# Altium PCB Control Board-v1.0.PcbDoc (part 1 of 8)
Units mil, origin at the board's own origin, x right, y up, seen from the top; angles counter-clockwise.
Board outline 7874.02 x 5118.11 mil, 4 copper layers (Top Layer, Layer 1, Layer 2, Bottom Layer), stack 61.654 mil thick; 475 components, 366 nets, 1579 pads, 587 vias.
Unrouted connection lines stored in the file: 427.
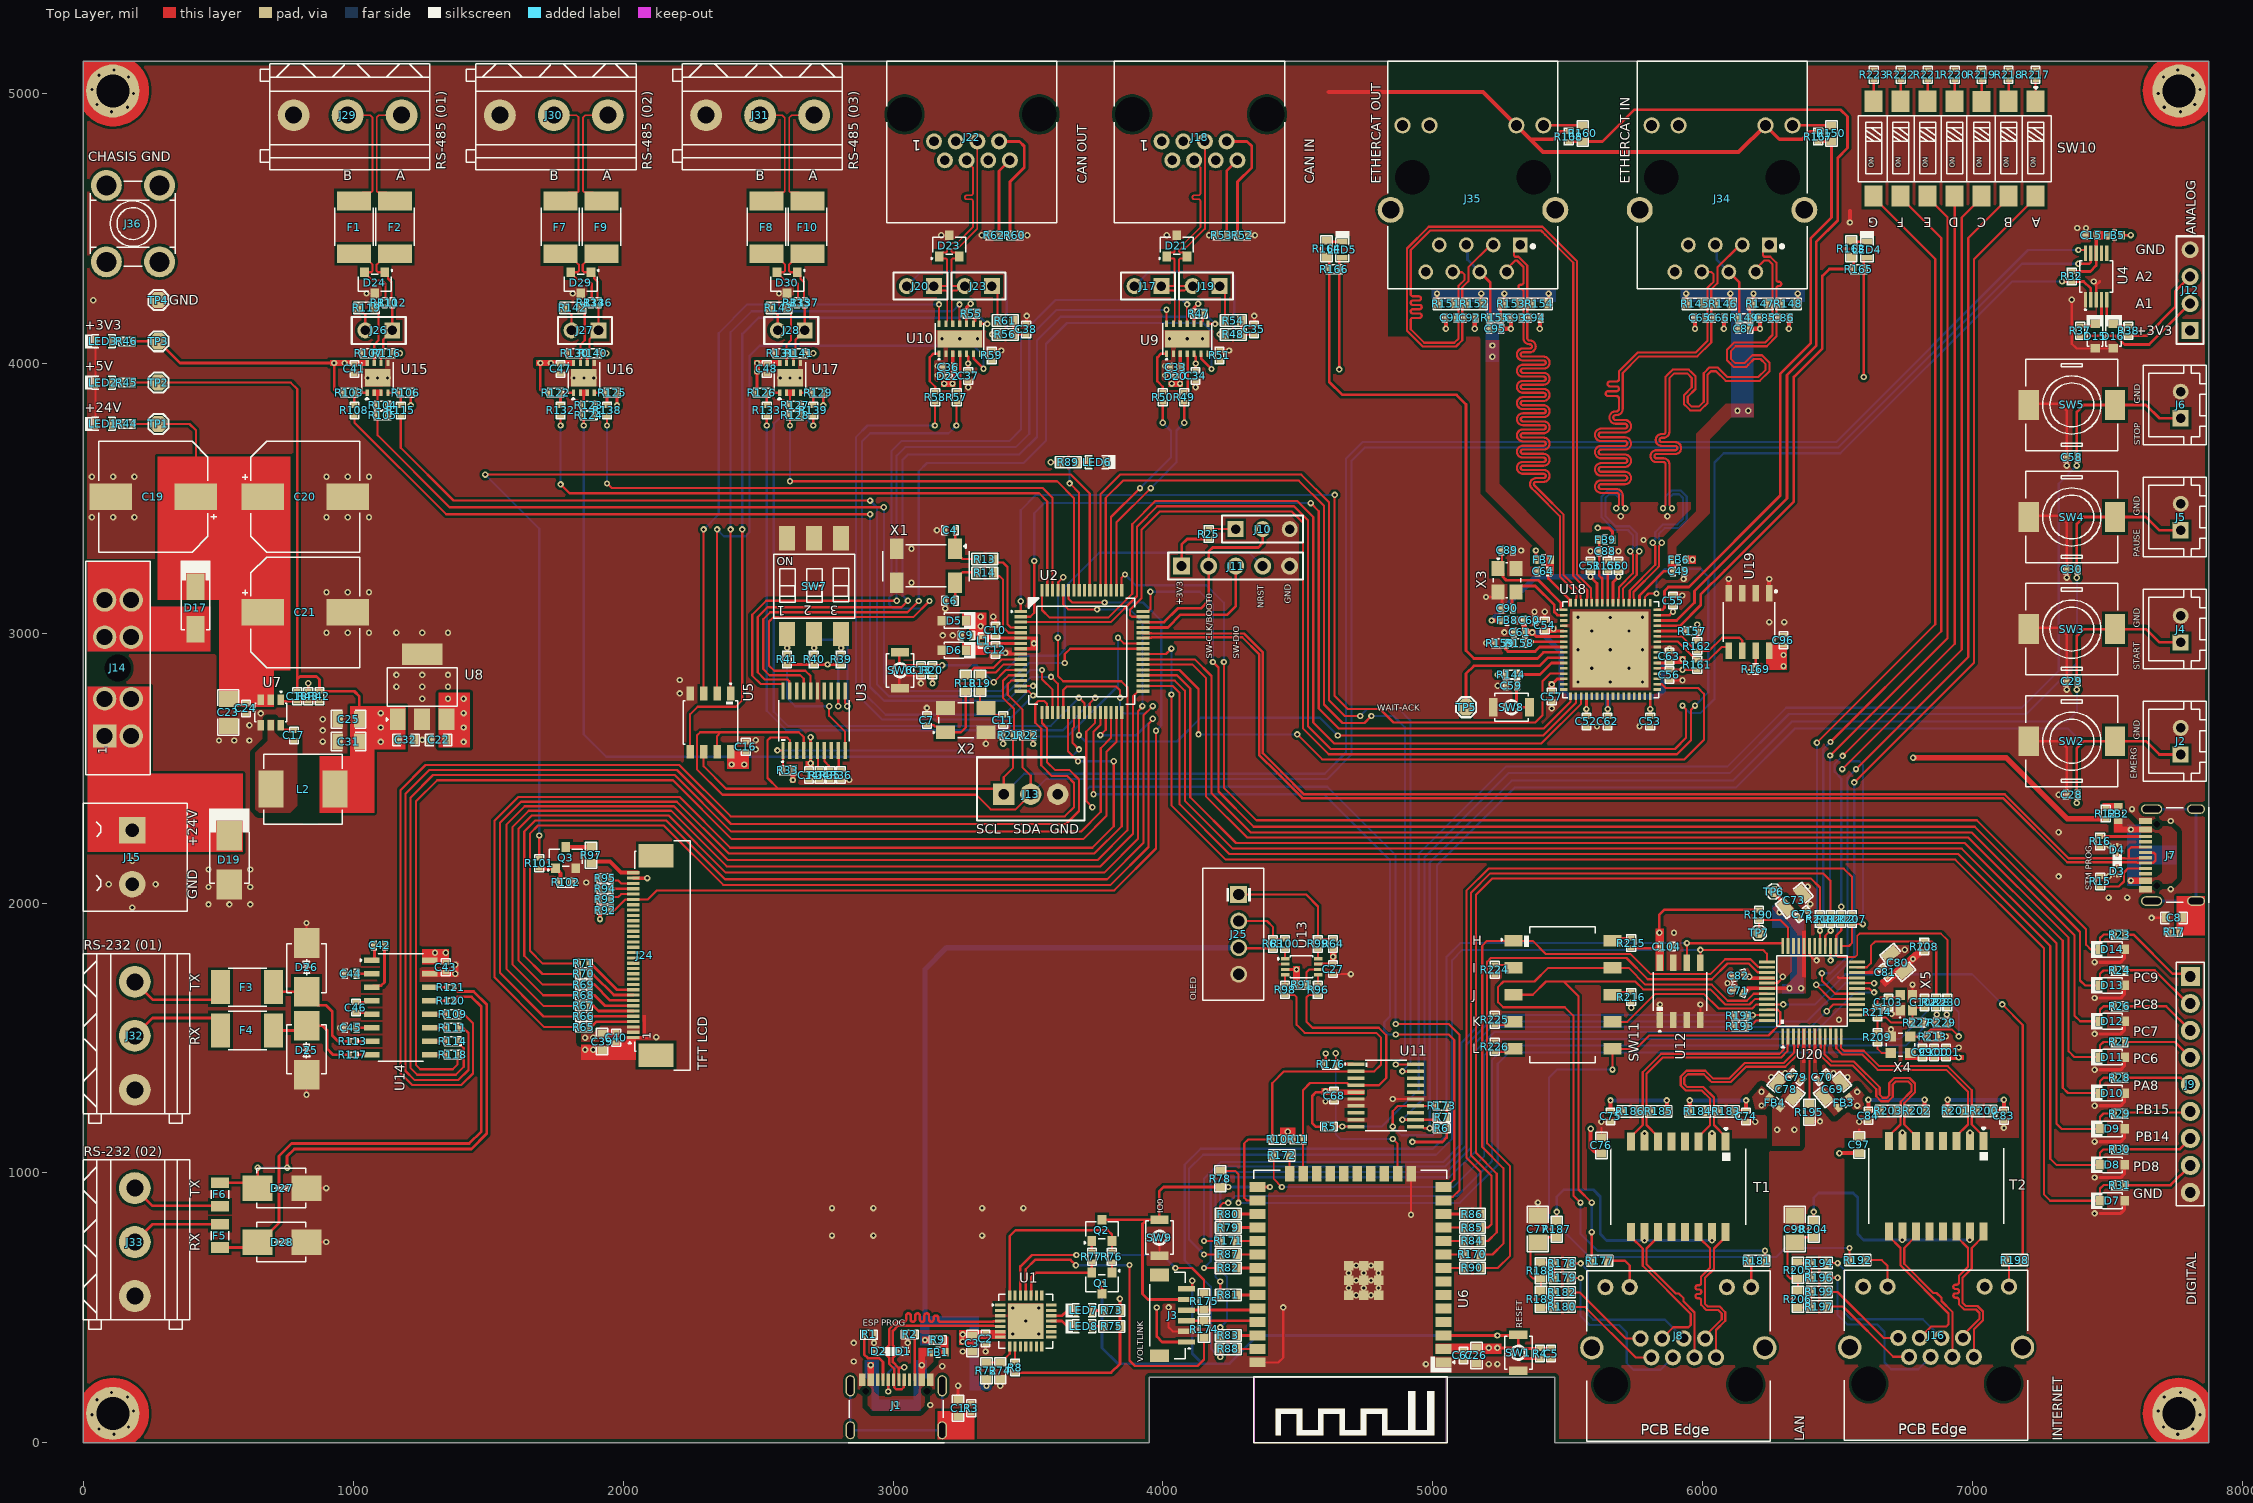
[diagram p0: Top Layer view]
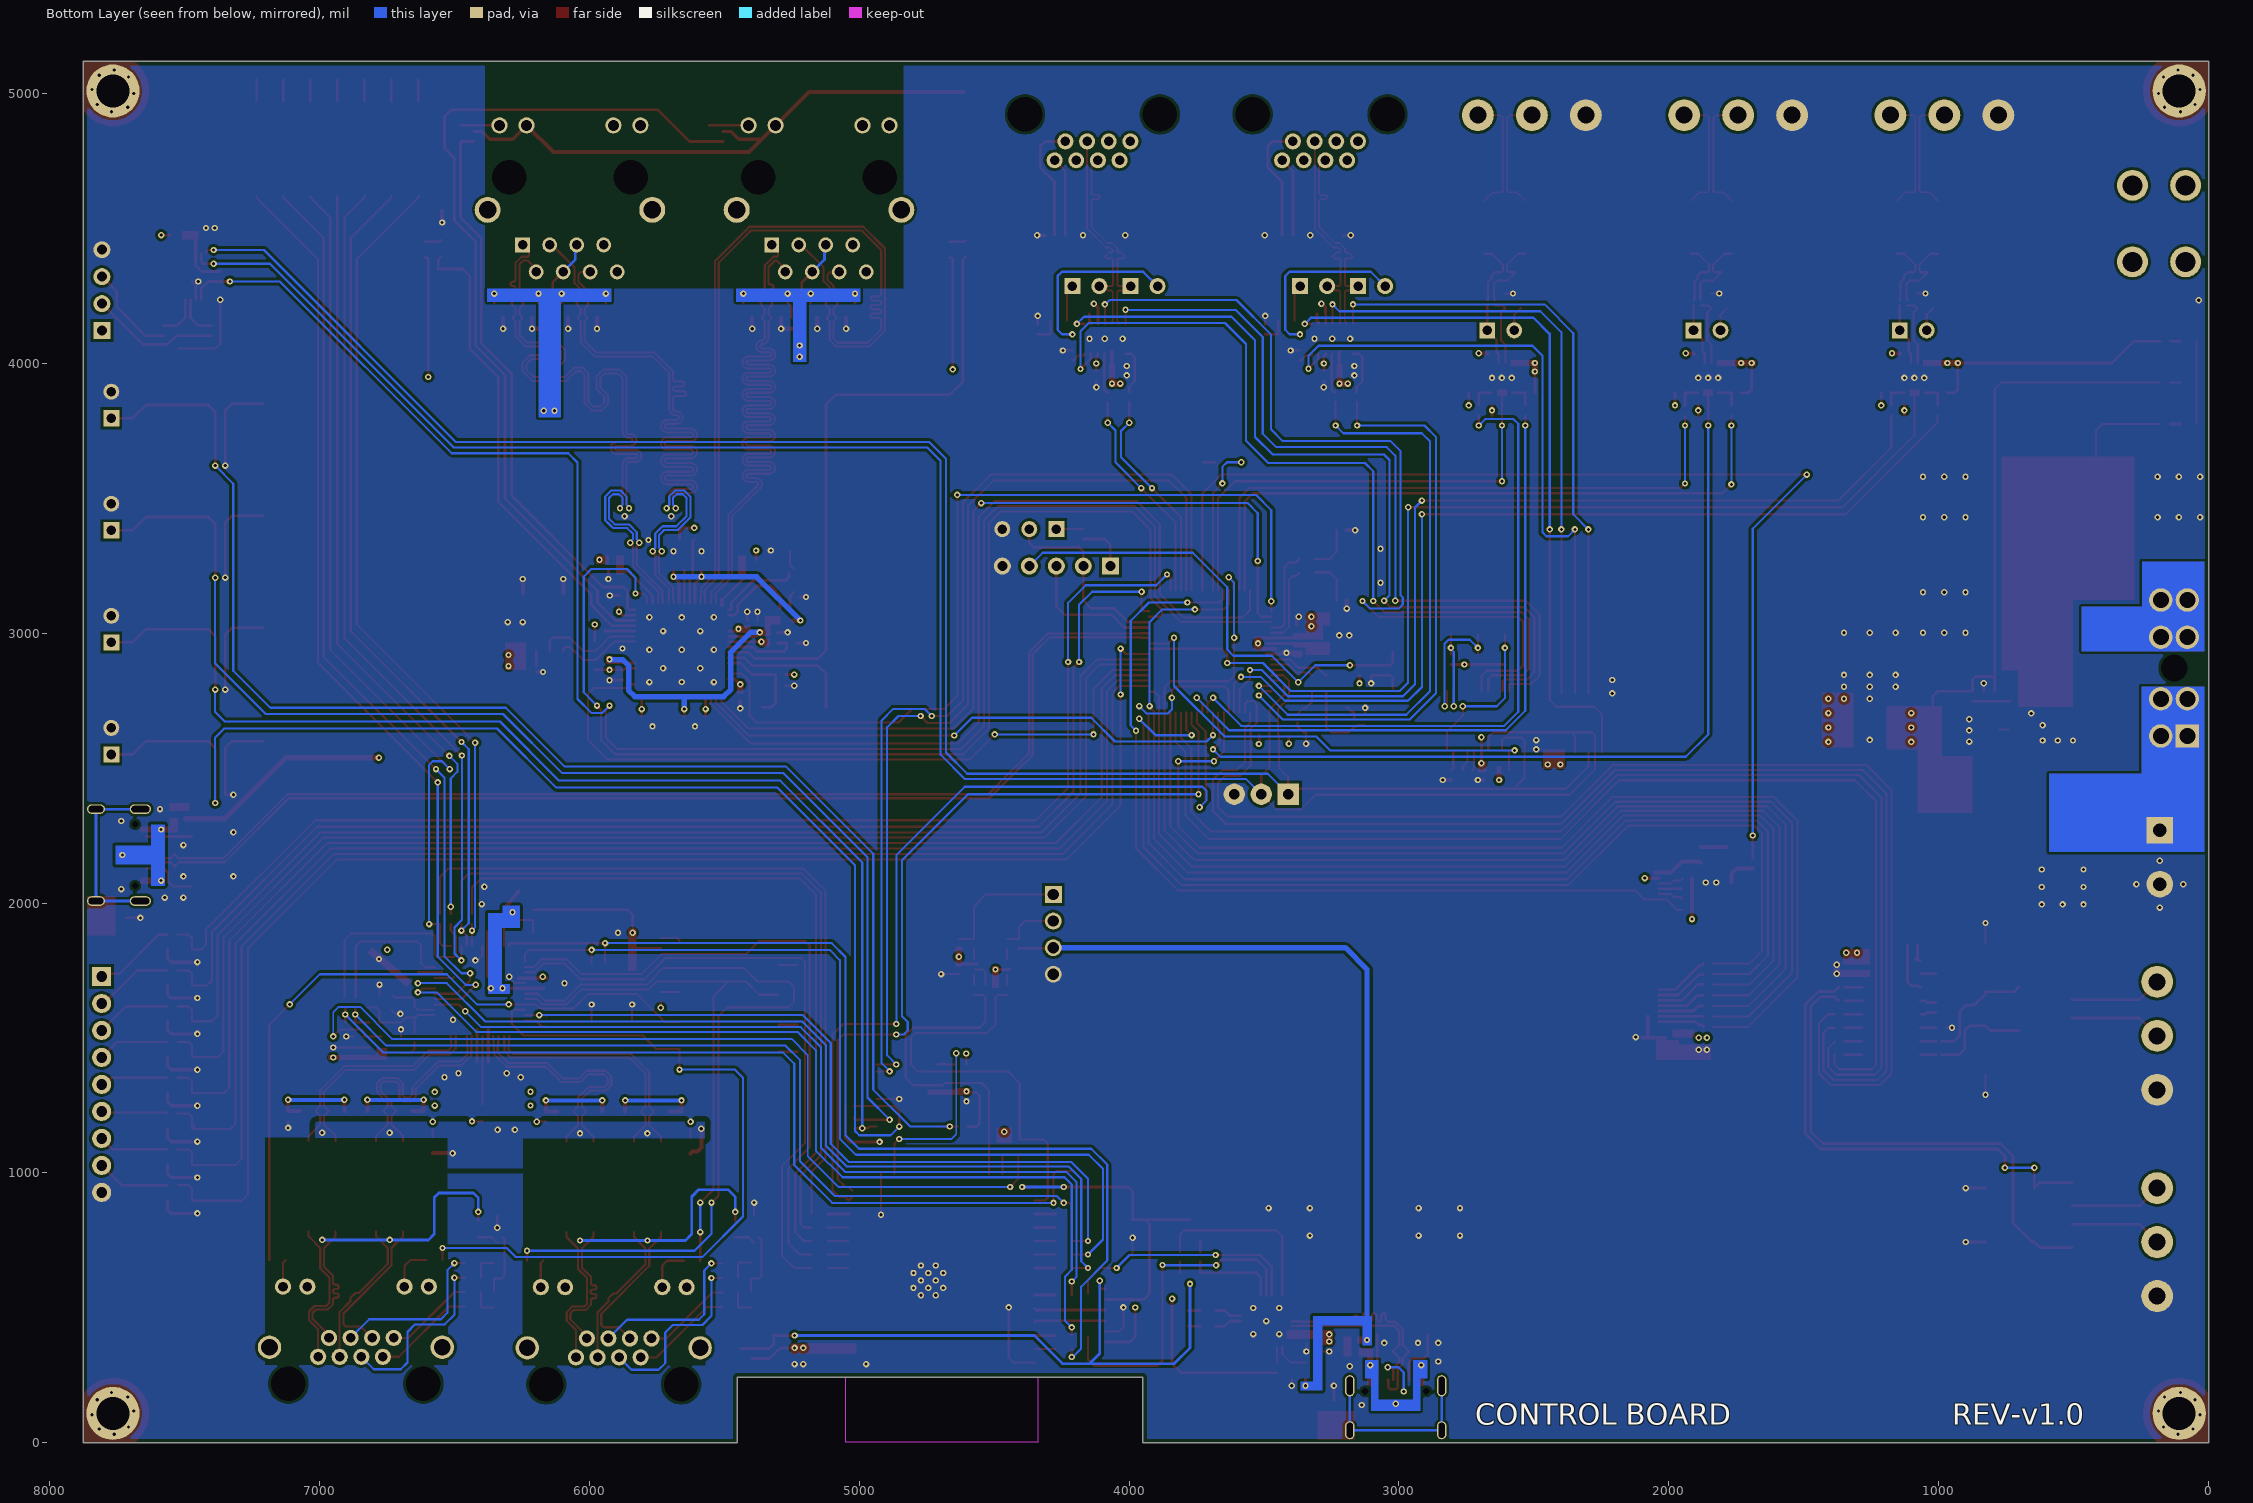
[diagram p1: Bottom Layer view, seen from below]
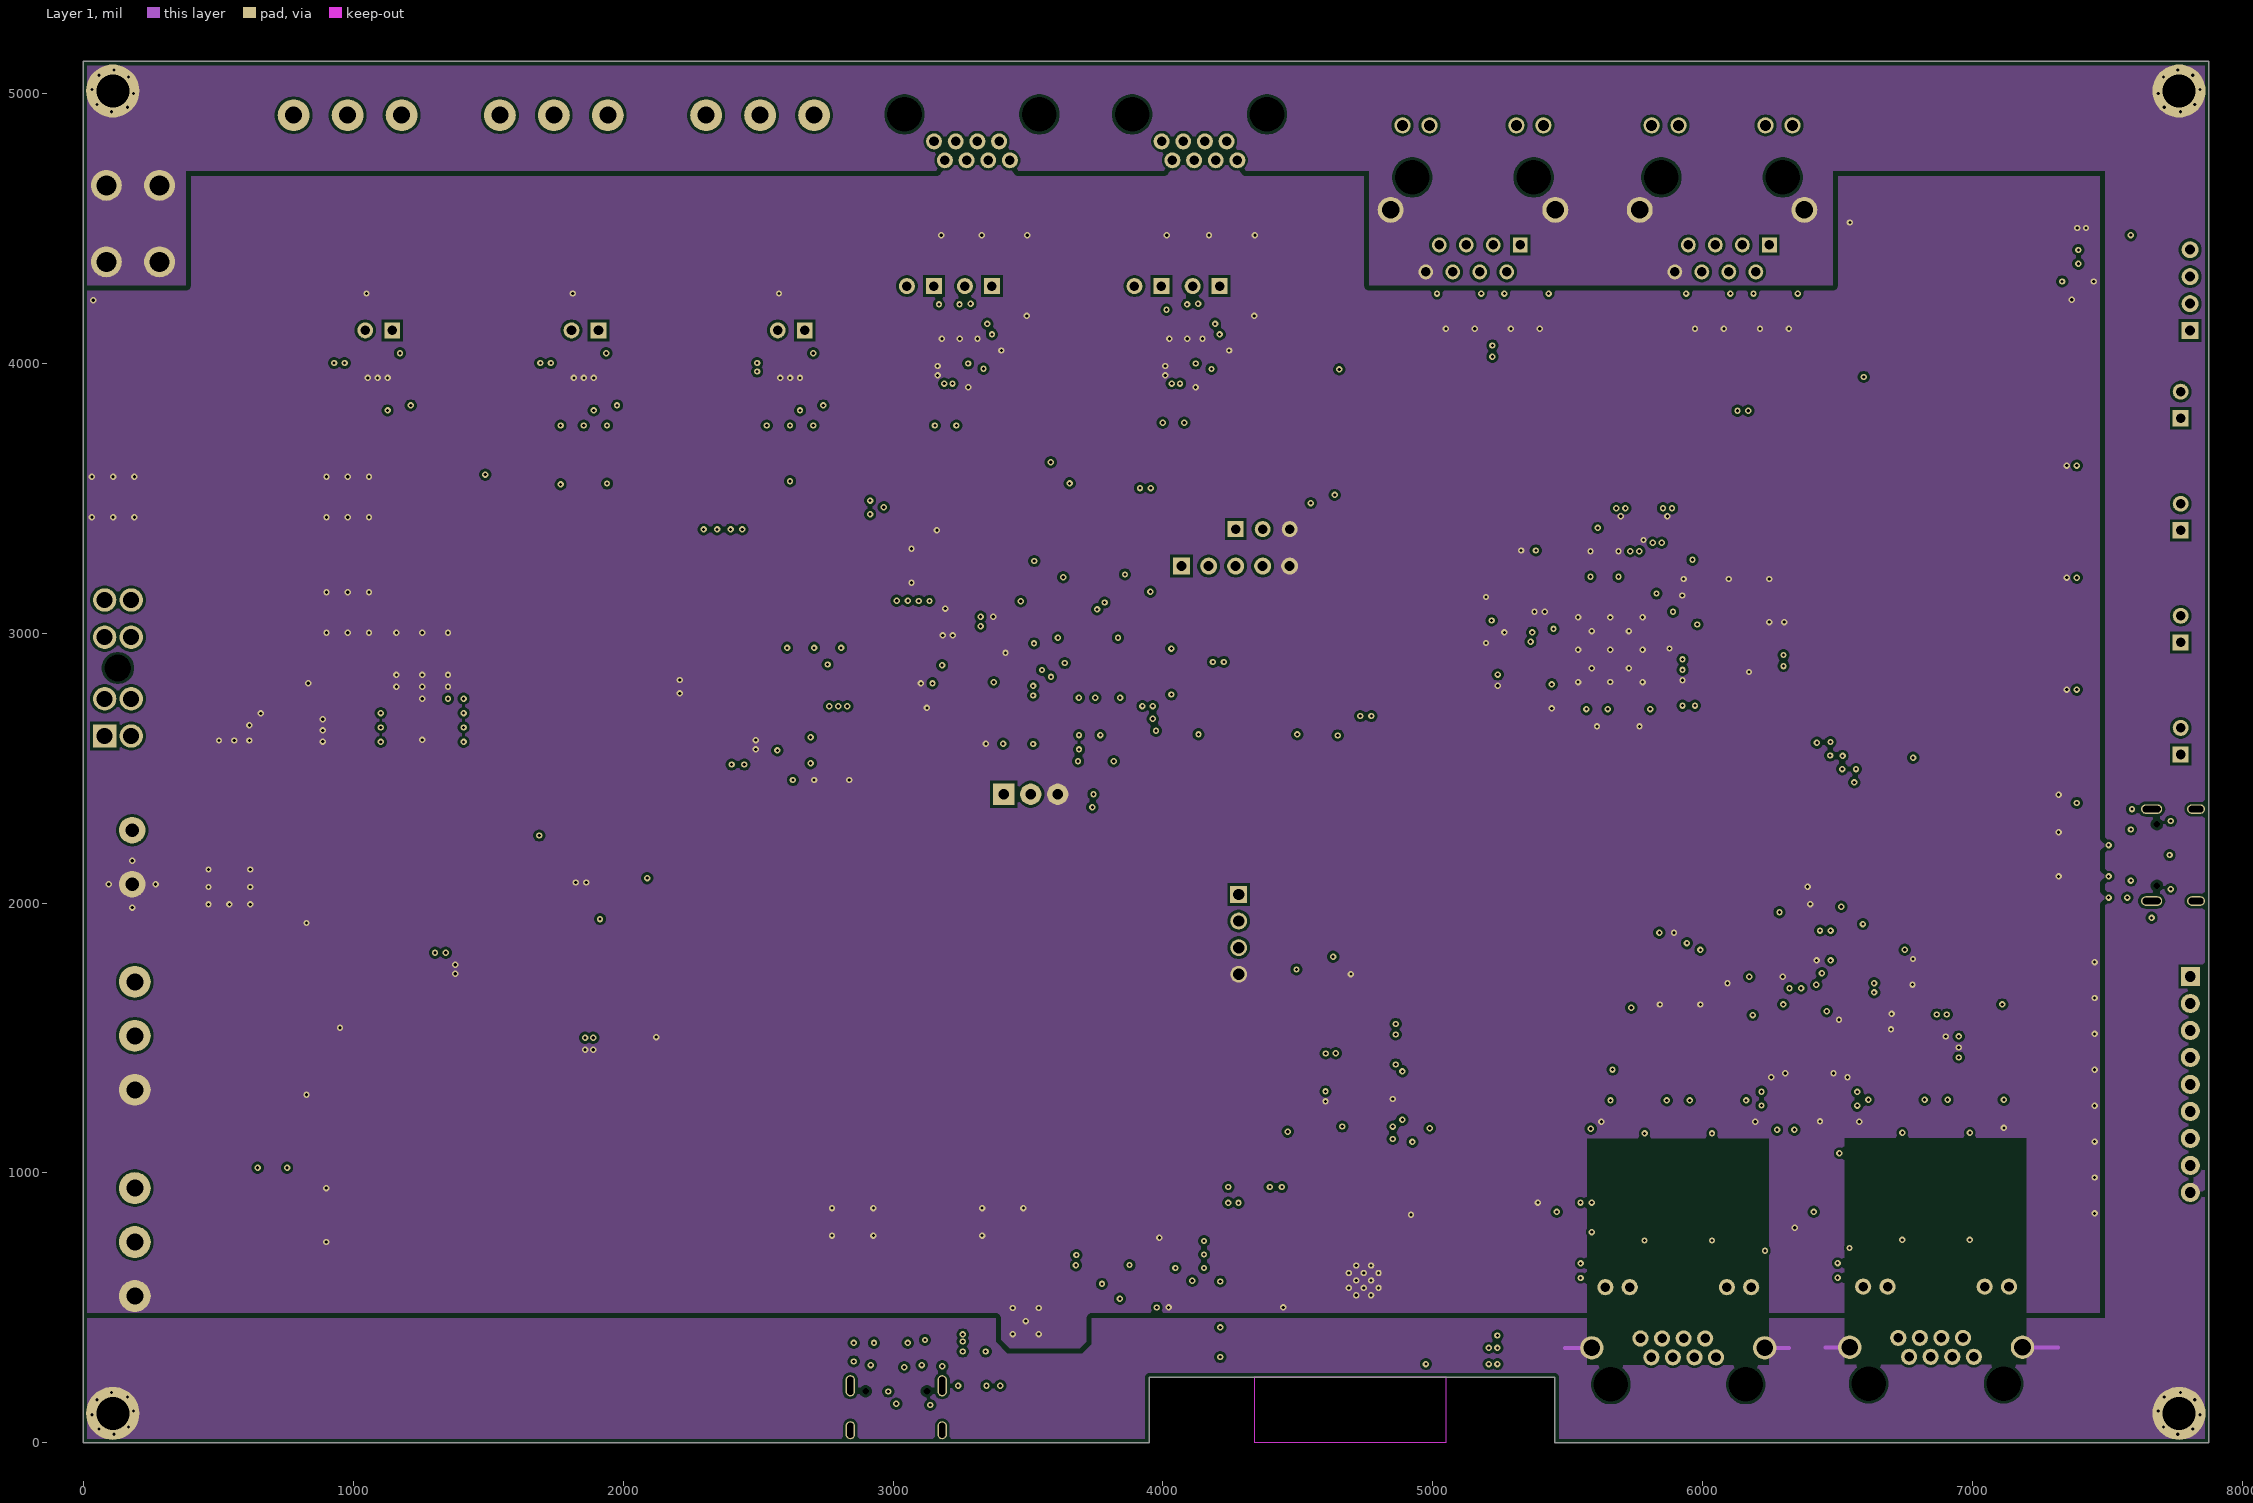
[diagram p2: Layer 1]
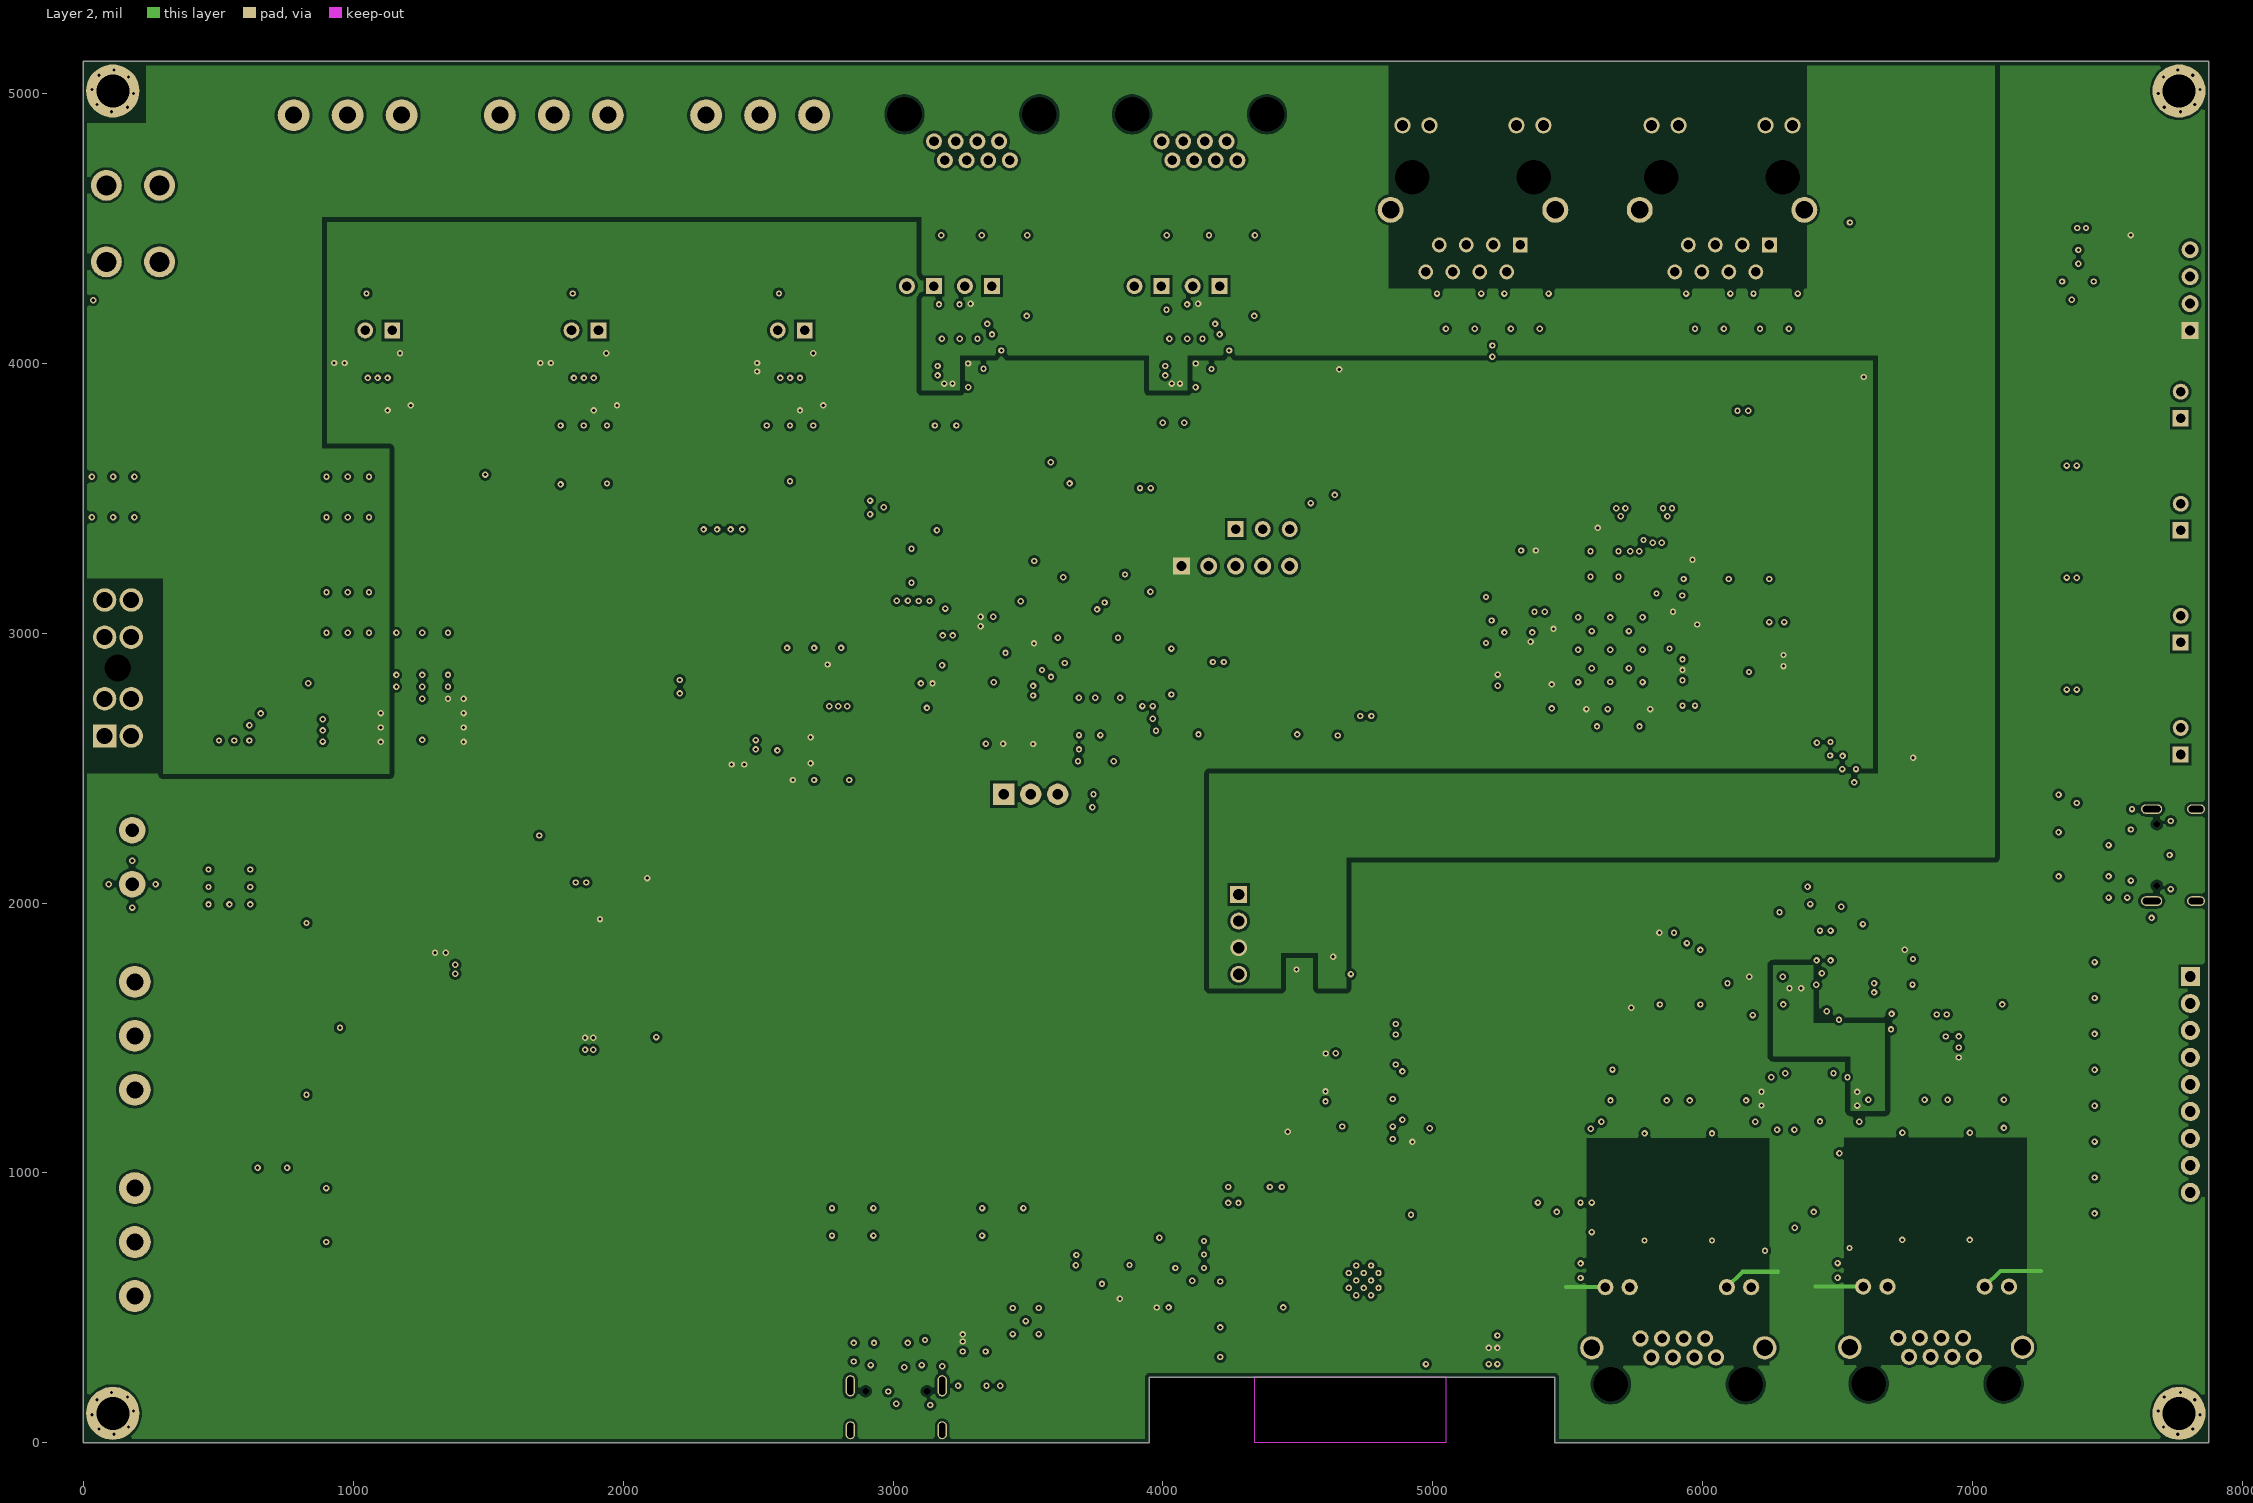
[diagram p3: Layer 2]
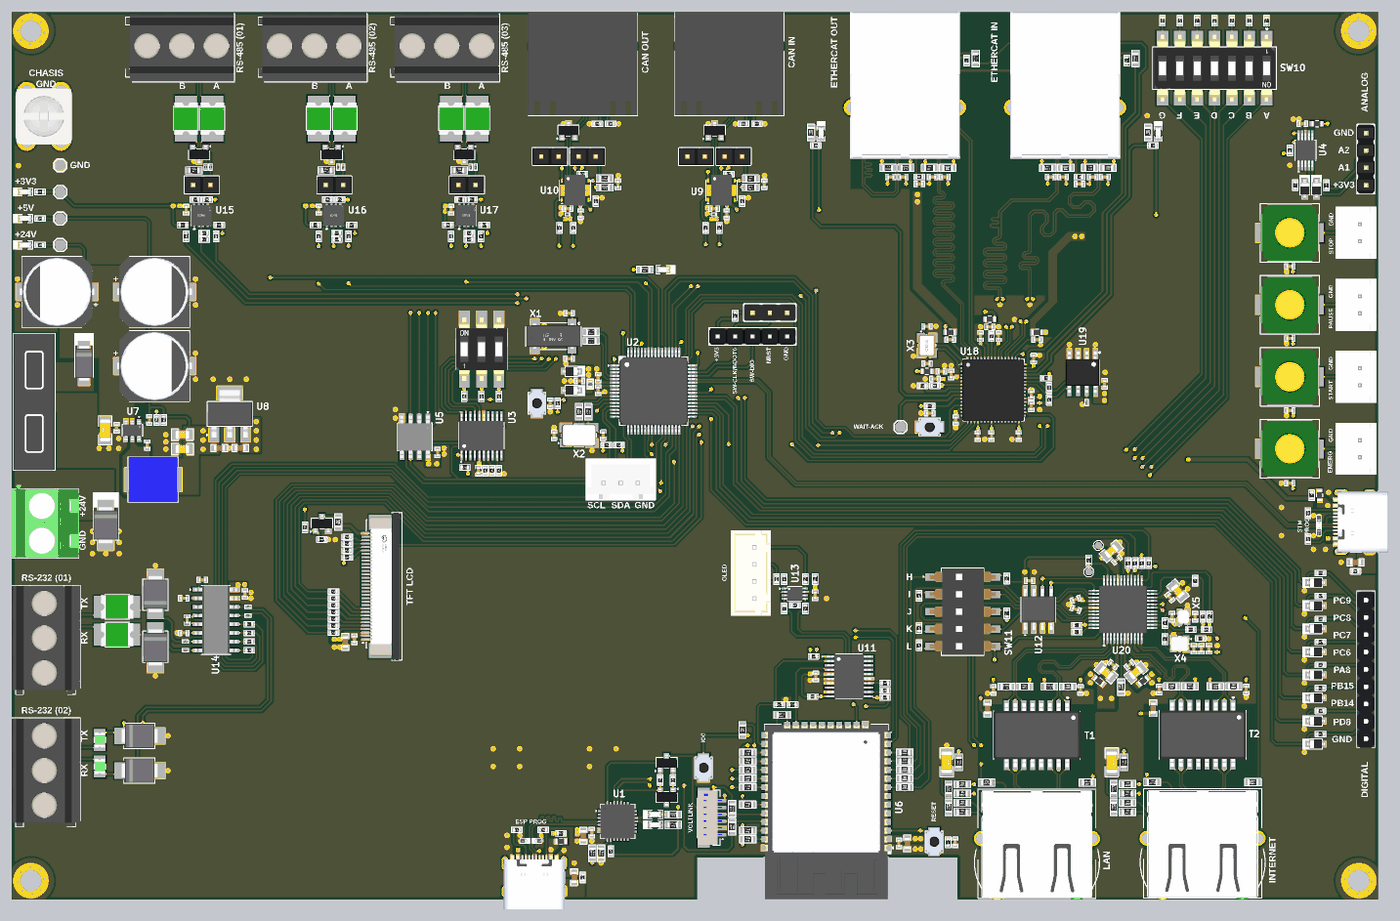
[diagram p8: 3D render of the assembled board from above, using the file's embedded part models]

## Layer stack, top to bottom
Top Solder: solder mask 0.787, Solder Resist, Dk 3.5
Top Layer: signal copper 1.378
Dielectric 2: prepreg 7.9921, PP-006, Dk 4.4
Layer 1: signal copper 1.1811
Dielectric 1: core 40.5512, FR-4, Dk 4.6
Layer 2: signal copper 1.1811
Dielectric 3: prepreg 7.9921, PP-006, Dk 4.4
Bottom Layer: signal copper 1.378
Bottom Solder: solder mask 0.787, Solder Resist, Dk 3.5

## Board outline
0,0 0,5118.11 7874.02,5118.11 7874.02,0 5451.93,0 5451.93,244.11 3948.53,244.11 3948.53,0

## Design rules (kind name [scope] priority, off if disabled: settings)
BoardOutlineClearance [All] p1: gap=0 ignorepadtopadclearanceinfootprint=FALSE except(15: Poly-OutlineEdge)
Clearance [All] p1: gap=10 ignorepadtopadclearanceinfootprint=FALSE except(5: Arc-Track Arc-THPad Track-Track Track-THPad SMDPad-Hole; 6: Arc-Arc SMDPad-THPad; 7: Arc-SMDPad Track-SMDPad SMDPad-SMDPad SMDPad-Fill THPad-Fill Fill-Fill Fill-Hole; 8: Arc-Fill Track-Via Track-Fill; 20: Poly-Poly)
DiffPairsRouting Ethernet [InDifferentialPairClass('Ethernet Lines')] p1: maxlimit=10 minlimit=6 mostfreqgap=10 toplayer_maxgap=6 toplayer_prefgap=6 toplayer_minwidth=8 toplayer_maxwidth=8 toplayer_prefwidth=8 bottomlayer_maxgap=6 bottomlayer_prefgap=6 bottomlayer_minwidth=8 bottomlayer_maxwidth=8 bottomlayer_prefwidth=8 impedanceprofiledriven=TRUE impedanceprofileid={E2375095-BF4E-4929-BD81-C9DC39CB62B4} impedanceprofilevalue=100.000000 maxuncoupledlength=500
DiffPairsRouting Ethercat [InDifferentialPairClass('EtherCAT_A_Lines')] p2: maxlimit=10 minlimit=6 mostfreqgap=10 toplayer_maxgap=6 toplayer_prefgap=6 toplayer_minwidth=8 toplayer_maxwidth=8 toplayer_prefwidth=8 bottomlayer_maxgap=6 bottomlayer_prefgap=6 bottomlayer_minwidth=8 bottomlayer_maxwidth=8 bottomlayer_prefwidth=8 impedanceprofiledriven=TRUE impedanceprofileid={E2375095-BF4E-4929-BD81-C9DC39CB62B4} impedanceprofilevalue=100.000000 maxuncoupledlength=500
DiffPairsRouting "RS485 120" [InDifferentialPairClass('RS485_LINES')] p3: maxlimit=10 minlimit=10 mostfreqgap=10 toplayer_minwidth=6.5 toplayer_maxwidth=6.5 toplayer_prefwidth=6.5 bottomlayer_minwidth=6.5 bottomlayer_maxwidth=6.5 bottomlayer_prefwidth=6.5 impedanceprofiledriven=TRUE impedanceprofileid={57E785CF-240E-48B3-B531-E0493D17EEC1} impedanceprofilevalue=120.000000 maxuncoupledlength=500
DiffPairsRouting CAN [InDifferentialPairClass('CAN_Lines')] p4: maxlimit=10 minlimit=10 mostfreqgap=10 toplayer_minwidth=6.5 toplayer_maxwidth=6.5 toplayer_prefwidth=6.5 bottomlayer_minwidth=6.5 bottomlayer_maxwidth=6.5 bottomlayer_prefwidth=6.5 impedanceprofiledriven=TRUE impedanceprofileid={57E785CF-240E-48B3-B531-E0493D17EEC1} impedanceprofilevalue=120.000000 maxuncoupledlength=500
DiffPairsRouting USB [InDifferentialPairClass('USB_PROGRAM_LINES')] p5: maxlimit=10 minlimit=5 mostfreqgap=10 toplayer_maxgap=5 toplayer_prefgap=5 toplayer_minwidth=9 toplayer_maxwidth=9 toplayer_prefwidth=9 bottomlayer_maxgap=5 bottomlayer_prefgap=5 bottomlayer_minwidth=9 bottomlayer_maxwidth=9 bottomlayer_prefwidth=9 impedanceprofiledriven=TRUE impedanceprofileid={29A86D70-821F-4898-9481-CB8ACAF6D4DB} impedanceprofilevalue=90.000000 maxuncoupledlength=500
HoleSize [All] p1: absolutevalues=TRUE maxlimit=150 minlimit=1 maxpercent=80.000 minpercent=20.000
MatchedLengths "Schematic Matched Net Lengths_4" [InNetClass('RS485')] p1: tolerance=20 checknetsindiffpair=TRUE checkdiffpairvsdiffpair=FALSE checkxsignals=FALSE checkothers=FALSE
MatchedLengths "Schematic Matched Net Lengths_8" [InDifferentialPairClass('Ethernet-2 A Lines')] p2: tolerance=20 checknetsindiffpair=FALSE checkdiffpairvsdiffpair=TRUE checkxsignals=TRUE checkothers=TRUE
MatchedLengths "Schematic Matched Net Lengths_7" [InDifferentialPairClass('Ethernet-2 B Lines')] p3: tolerance=20 checknetsindiffpair=FALSE checkdiffpairvsdiffpair=TRUE checkxsignals=TRUE checkothers=TRUE
MatchedLengths "Schematic Matched Net Lengths_6" [InDifferentialPairClass('Ethernet-1 B Lines')] p4: tolerance=20 checknetsindiffpair=FALSE checkdiffpairvsdiffpair=TRUE checkxsignals=TRUE checkothers=TRUE
MatchedLengths "Schematic Matched Net Lengths_5" [InDifferentialPairClass('Ethernet-1 A Lines')] p5: tolerance=20 checknetsindiffpair=FALSE checkdiffpairvsdiffpair=TRUE checkxsignals=TRUE checkothers=TRUE
MatchedLengths "Schematic Matched Net Lengths_2" [InNetClass('USB')] p6: tolerance=50 checknetsindiffpair=TRUE checkdiffpairvsdiffpair=FALSE checkxsignals=FALSE checkothers=FALSE
MatchedLengths "Schematic Matched Net Lengths_1" [InNetClass('EtherCAT_A')] p7: tolerance=25.4 checknetsindiffpair=FALSE checkdiffpairvsdiffpair=TRUE checkxsignals=TRUE checkothers=TRUE
MatchedLengths [InDifferentialPairClass('CAN_Lines')] p8: tolerance=20 checknetsindiffpair=TRUE checkdiffpairvsdiffpair=FALSE checkxsignals=FALSE checkothers=FALSE
MatchedLengths "Schematic Matched Net Lengths_3" [InDifferentialPairClass('USB_PROGRAM_LINES')] p9: tolerance=50 checknetsindiffpair=TRUE checkdiffpairvsdiffpair=FALSE checkxsignals=FALSE checkothers=FALSE
MaxMinImpedance "Schematic Impedance Constraint_8" [InDifferentialPairClass('Ethernet-2 B Lines')] p1: minimum=97.00 maximum=103.0
MaxMinImpedance "Schematic Impedance Constraint_7" [InDifferentialPairClass('Ethernet-1 A Lines')] p2: minimum=97.00 maximum=103.0
MaxMinImpedance "Schematic Impedance Constraint_6" [InDifferentialPairClass('Ethernet-2 A Lines')] p3: minimum=97.00 maximum=103.0
MaxMinImpedance "Schematic Impedance Constraint_2" [InDifferentialPairClass('Ethernet-1 B Lines')] p4: minimum=97.00 maximum=103.0
MaxMinImpedance "Schematic Impedance Constraint_5" [InDifferentialPairClass('USB_PROGRAM_LINES')] p5: minimum=85.00 maximum=90.00
MaxMinImpedance "Schematic Impedance Constraint_4" [InNetClass('USB')] p6: minimum=85.00 maximum=90.00
MaxMinImpedance "Schematic Impedance Constraint_3" [InNetClass('RS485')] p7: minimum=115.0 maximum=125.0
MaxMinImpedance "Schematic Impedance Constraint_1" [InNetClass('EtherCAT_A')] p8: minimum=85.00 maximum=95.00
MinimumSolderMaskSliver [All] p1: minsoldermaskwidth=0
PolygonConnect [All] p1: connectstyle=Direct reliefconductorwidth=10 reliefentries=4 polygonreliefangle="90 Angle" airgapwidth=10
RoutingVias [All] p1: holewidth=11.81 width=23.62 viastyle="Through Hole" minholewidth=11.81 minwidth=23.62 maxholewidth=11.81 maxwidth=23.62
SilkToSilkClearance [All] p1: silktosilkclearance=0
SilkToSolderMaskClearance [IsPad] p1: minsilkscreentomaskgap=0 clearancetoexposedcopper=TRUE
SolderMaskExpansion [All] p1: expansion=4 istentingtop=FALSE
SupplyNets "Schematic Supply Nets_11" [InNet('VDD33TXRX2')] p1: voltage=0.000
SupplyNets "Schematic Supply Nets_10" [InNet('+1.8V')] p2: voltage=0.000
SupplyNets "Schematic Supply Nets_9" [InNet('VDD33TXRX1')] p3: voltage=0.000
SupplyNets "Schematic Supply Nets_8" [InNet('+3V3-A')] p4: voltage=0.000
SupplyNets "Schematic Supply Nets_7" [InNet('CHASIS GND')] p5: voltage=0.000
SupplyNets "Schematic Supply Nets_6" [InNet('GND')] p6: voltage=0.000
SupplyNets "Schematic Supply Nets_5" [InNet('+24V')] p7: voltage=0.000
SupplyNets "Schematic Supply Nets_4" [InNet('+5V')] p8: voltage=0.000
SupplyNets "Schematic Supply Nets_3" [InNet('+1.8V-A')] p9: voltage=0.000
SupplyNets "Schematic Supply Nets_2" [InNet('+3V3')] p10: voltage=0.000
SupplyNets "Schematic Supply Nets_1" [InNet('VDDCR')] p11: voltage=0.000
SupplyNets "Schematic Supply Nets" [InNet('VDD12TX1')] p12: voltage=0.000
UnRoutedNet [All] p1: checkbadconnections=TRUE
Width [All] p1: maxlimit=30 minlimit=7 preferedwidth=15 toplayer_prefwidth=10 midlayer1_minwidth=10 midlayer1_maxwidth=20 midlayer2_minwidth=10 midlayer2_maxwidth=20 bottomlayer_prefwidth=10 minimp=50.000000 maximp=50.000000 favimp=50.000000
24 further rules are at their usual default settings.

## Classes and differential pairs
differential pair class "Ethernet-2 B Lines": RX2 TX2
differential pair class "Ethernet-2 A Lines": 2RX 2TX
differential pair class "Ethernet-1 A Lines": 1RX 1TX
differential pair class "Ethernet-1 B Lines": RX1 TX1
differential pair class USB_Lines: ESPUSB
net class USB: ESPUSB_N ESPUSB_P
differential pair class USB_PROGRAM_LINES: ESPUSB USB
differential pair class RS485_LINES: RS485 RS485-2 RS485-3
differential pair class EtherCAT_A_Lines: RXA RXB TXA TXB
differential pair class CAN_Lines: CAN1 CAN2
net class USB_PROGRAM: ESPUSB_N ESPUSB_P USB_N USB_P
net class RS485: RS485-2_N RS485-2_P RS485-3_N RS485-3_P RS485_N RS485_P
net class EtherCAT_A: RXA_N RXA_P RXB_N RXB_P TXA_N TXA_P TXB_N TXB_P
net class CAN: CAN1_N CAN1_P CAN2_N CAN2_P
component class U_TFT_Display_Sheet: C27 C39 C40 J24 J25 Q3 R63 R64 R65 R66 R67 R68 R69 R70 R71 R91 R92 R93 R94 R95 R96 R97 R98 R99 R100 R101 R102 U13
component class U_STM32_Sheet: C4 C6 C7 C8 C9 C10 C11 C12 C13 C14 C15 C16 D3 D4 D5 D6 D7 D8 D9 D10 D11 D12 D13 D14 D15 D16 FB2 FB5 J7 J9 J10 J11 J12 J13 L1 LED6 R12 R13 R14 R15 R16 R17 R18 R19 R20 R21 R22 R23 R24 R25 R26 R27 R28 R29 R30 R31 R32 R33 R34 R35 R36 R37 R38 R39 R40 R41 R89 SW6 SW7 U2 U3 U4 U5 X1 X2
component class U_RS485_RS232_Sheet: C41 C42 C43 C44 C45 C46 C47 C48 D24 D25 D26 D27 D28 D29 D30 F1 F2 F3 F4 F5 F6 F7 F8 F9 F10 J26 J27 J28 J29 J30 J31 J32 J33 R103 R104 R105 R106 R107 R108 R109 R110 R111 R112 R113 R114 R115 R116 R117 R118 R119 R120 R121 R122 R123 R124 R125 R126 R127 R128 R129 R130 R131 R132 R133 R134 R135 R136 R137 R138 R139 R140 R141 R142 R143 U14 U15 U16 U17
component class U_Power_Sheet: C17 C18 C19 C20 C21 C22 C23 C24 C25 C31 C32 D17 D19 J14 J15 L2 LED1 LED2 LED3 R42 R43 R44 R45 R46 TP1 TP2 TP3 TP4 U7 U8
component class U_Ethernet_Sheet: C69 C70 C71 C72 C73 C74 C75 C76 C77 C78 C79 C80 C81 C82 C83 C84 C97 C98 C99 C100 C101 C102 C103 C104 FB3 FB4 J8 J16 R177 R178 R179 R180 R181 R182 R183 R184 R185 R186 R187 R188 R189 R190 R191 R192 R193 R194 R195 R196 R197 R198 R199 R200 R201 R202 R203 R204 R205 R206 R207 R208 R209 R210 R211 R212 R213 R214 R215 R216 R217 R218 R219 R220 R221 R222 R223 R224 R225 R226 R227 R228 R229 R230 SW10 SW11 T1 T2 TP6 TP7 U12 U20 X4 X5
component class U_EtherCAT_Sheet: C49 C50 C51 C52 C53 C54 C55 C56 C57 C59 C60 C61 C62 C63 C64 C65 C66 C85 C86 C87 C88 C89 C90 C91 C92 C93 C94 C95 C96 FB6 FB7 FB8 FB9 J34 J35 J36 LED4 LED5 R144 R145 R146 R147 R148 R149 R150 R151 R152 R153 R154 R155 R156 R157 R158 R159 R160 R161 R162 R163 R164 R165 R166 R167 R168 R169 SW8 TP5 U18 U19 X3
component class U_ESP32_Sheet: C1 C2 C3 C5 C26 C28 C29 C30 C58 C67 C68 D1 D2 FB1 J1 J2 J3 J4 J5 J6 LED7 LED8 Q1 Q2 R1 R2 R3 R4 R5 R6 R7 R8 R9 R10 R11 R72 R73 R74 R75 R76 R77 R78 R79 R80 R81 R82 R83 R84 R85 R86 R87 R88 R90 R170 R171 R172 R173 R174 R175 R176 SW1 SW2 SW3 SW4 SW5 SW9 U1 U6 U11
component class U_CAN_Sheet: C33 C34 C35 C36 C37 C38 D20 D21 D22 D23 J17 J18 J19 J20 J22 J23 R47 R48 R49 R50 R51 R52 R53 R54 R55 R56 R57 R58 R59 R60 R61 R62 U9 U10
differential pair TX2: +TX2_P -TX2_N
differential pair TX1: +TX1_P -TX1_N
differential pair RX2: +RX2_P -RX2_N
differential pair RX1: +RX1_P -RX1_N
differential pair 2TX: +2TX_P -2TX_N
differential pair 2RX: +2RX_P -2RX_N
differential pair 1TX: +1TX_P -1TX_N
differential pair 1RX: +1RX_P -1RX_N
differential pair USB: +USB_P -USB_N
differential pair TXB: +TXB_P -TXB_N
differential pair TXA: +TXA_P -TXA_N
differential pair RXB: +RXB_P -RXB_N
differential pair RXA: +RXA_P -RXA_N
differential pair RS485: +RS485_P -RS485_N
differential pair RS485-3: +RS485-3_P -RS485-3_N
differential pair RS485-2: +RS485-2_P -RS485-2_N
differential pair ESPUSB: +ESPUSB_P -ESPUSB_N
differential pair CAN2: +CAN2_P -CAN2_N
differential pair CAN1: +CAN1_P -CAN1_N

## Components (designator, comment, footprint, x,y, rotation, side; value= is the part's Value field where it differs from the comment)
C1 "4.7nF" Cap-0603 3240.84,128.46 r270 top
C2 "1uF" Cap-0402 3342.99,386.41 r270 top
C3 "4.7UF" Cap-0603 3293.99,368.41 r90 top
C4 "DNP" Cap-0402 3211.4,3381.04 r0 top value=6.8pF
C5 "1uF" Cap-0402 5438,330.97 r90 top
C6 "DNP" Cap-0402 3211.4,3120.04 r180 top value=6.8pF
C7 "30pF" Cap-0402 3125.46,2677.84 r270 top
C8 "4.7nF" Cap-0603 7745.54,1945.11 r0 top
C9 "4.7uF" Cap-0402 3271.77,2991.42 r0 top
C10 "100nF" cap-0402 3379.27,3009.92 r270 top
C11 "30pF" Cap-0402 3408.46,2677.84 r90 top
C12 "0.1uF" Cap-0402 3379.27,2937.54 r90 top value=100nF
C13 "0.1uF" Cap-0402 3102.96,2862.34 r90 top value=100nF
C14 "100nF" cap-0402 2688.56,2474.18 r90 top
C15 "100nF" cap-0402 7438.6,4474.4 r180 top
C16 "100nF" cap-0402 2454.08,2578.68 r270 top
C17 "0.1uF" Cap-0402 780.06,2621.07 r90 top
C18 "47pF" Cap-0402 792.56,2766.22 r90 top
C19 "220uF" UCD-220uF-10mmDia 260,3504.9 r180 top
C20 "220uF" UCD-220uF-10mmDia 822.23,3504.9 r0 top
C21 "220uF" UCD-220uF-10mmDia 822.23,3076.9 r0 top
C22 "4.7uF" Cap-0603 1316.1,2604.3 r0 top
C23 "10uF" Cap-1206 537.8,2706.15 r90 top
C24 "100nF" cap-0402 602.8,2721.15 r90 top
C25 "22uF" Cap-0805 982.8,2681.15 r0 top
C26 "10uF" Cap-0603 5161,324 r90 top
C27 "0.1uF" Cap-0402 4630.46,1755.2 r90 top
C28 "0.1uF" Cap-0402 7367,2401.11 r0 top value=100nF
C29 "0.1uF" Cap-0402 7367,2821.11 r0 top value=100nF
C30 "0.1uF" Cap-0402 7367,3236.11 r0 top value=100nF
C31 "22uF" Cap-0805 982.8,2598.15 r0 top
C32 "4.7uF" Cap-0603 1195,2604.3 r180 top
C33 "0.1uF" Cap-0402 4047.31,3984.65 r180 top value=100nF
C34 "0.1uF" Cap-0402 4120.98,3952.65 r90 top value=100nF
C35 "4.7nF" Cap-0402 4337.31,4125.15 r90 top
C36 "0.1uF" Cap-0402 3204.23,3984.65 r180 top value=100nF
C37 "0.1uF" Cap-0402 3278.32,3952.65 r90 top value=100nF
C38 "4.7nF" Cap-0402 3493.32,4125.15 r90 top
C39 "4.7uF" Cap-0603 1921.83,1486.31 r90 top
C40 "0.1uF" Cap-0402 1974.47,1501.31 r90 top value=100nF
C41 "0.1uf" Cap-0402 1004.2,3978.92 r90 top
C42 "0.1uf" Cap-0402 1097.5,1843.11 r0 top
C43 "0.1uf" Cap-0402 1343,1762.11 r90 top
C44 "0.1uf" Cap-0402 990.5,1737.99 r0 top
C45 "0.1uf" Cap-0402 990.5,1537.99 r0 top
C46 "0.1uf" Cap-0402 1010,1612.99 r270 top
C47 "0.1uf" Cap-0402 1768.2,3978.92 r90 top
C48 "0.1uf" Cap-0402 2532.2,3978.92 r90 top
C49 "100nF" cap-0402 5910.16,3228.84 r180 top
C50 "100nF" cap-0402 5687.49,3249.33 r270 top
C51 "100nF" cap-0402 5583.61,3249.33 r270 top
C52 "100nF" cap-0402 5568.69,2672.97 r90 top
C53 "100nF" cap-0402 5804.91,2672.97 r90 top
C54 "100nF" cap-0402 5414.3,3028.37 r270 top
C55 "100nF" cap-0402 5889.8,3120.83 r270 top
C56 "100nF" cap-0402 5876.3,2845.2 r90 top
C57 "100nF" cap-0402 5440.47,2764.83 r90 top
C58 "0.1uF" Cap-0402 7367,3651.11 r0 top value=100nF
C59 "100nF" cap-0402 5290.8,2805.33 r0 top
C60 "1uF" Cap-0402 5357.8,3046.87 r180 top
C61 "470pF" Cap-0402 5320.8,3002.58 r0 top
C62 "100nF" cap-0402 5647.43,2672.97 r90 top
C63 "100nF" cap-0402 5876.3,2913.47 r270 top
C64 "100nF" cap-0402 5408.97,3228.84 r0 top
C65 "10pF" Cap-0402 5989.32,4167.65 r0 top
C66 "10pF" Cap-0402 6059.34,4167.65 r180 top
C67 "0.1uF" Cap-0402 5113,324 r90 top value=100nF
C68 "0.1uF" Cap-0402 4634,1286.9 r270 top value=100nF
C69 "22uF" Cap-0805 6480.46,1309.66 r220 top
C70 "0.1uF" Cap-0402 6442.89,1354.68 r220 top value=100nF
C71 "0.1uF" Cap-0402 6131.79,1674.88 r340 top value=100nF
C72 "0.1uF" Cap-0402 6369.66,1959.18 r220 top value=100nF
C73 "22uF" Cap-0805 6338.38,2009.75 r220 top
C74 "0.1uF" Cap-0402 6160.11,1209.55 r90 top value=100nF
C75 "0.1uF" Cap-0402 5658.05,1209.55 r90 top value=100nF
C76 "10uF" Cap-0603 5624.11,1102 r270 top
C77 "1000pF" Cap-1206 5389,792 r270 top
C78 "22uF" Cap-0805 6308.52,1309.66 r320 top
C79 "0.1uF" Cap-0402 6346.44,1354.68 r320 top value=100nF
C80 "22uF" Cap-0805 6721.64,1779.38 r130 top
C81 "0.1uF" Cap-0402 6675.64,1742.77 r130 top value=100nF
C82 "0.1uF" Cap-0402 6131.79,1731.54 r20 top value=100nF
C83 "0.1uF" Cap-0402 7115.19,1211.59 r90 top value=100nF
C84 "0.1uF" Cap-0402 6613.13,1211.59 r90 top value=100nF
C85 "10pF" Cap-0402 6230.32,4167.65 r0 top
C86 "10pF" Cap-0402 6300.32,4167.65 r180 top
C87 "22nF" Cap-0402 6153.82,4127.65 r180 top
C88 "100nF" cap-0402 5637.93,3303.46 r180 top
C89 "30pF" Cap-0402 5274.74,3306.22 r180 top
C90 "30pF" Cap-0402 5274.74,3091.63 r0 top
C91 "10pF" Cap-0402 5066.49,4167.65 r0 top
C92 "10pF" Cap-0402 5136.52,4167.65 r180 top
C93 "10pF" Cap-0402 5307.49,4167.65 r0 top
C94 "10pF" Cap-0402 5377.49,4167.65 r180 top
C95 "22nF" Cap-0402 5230.99,4127.65 r180 top
C96 "100nF" cap-0402 6298.8,2973.83 r270 top
C97 "10uF" Cap-0603 6579.27,1104.04 r270 top
C98 "1000pF" Cap-1206 6340.5,792 r270 top
C99 "100pF" Cap-0402 6813.63,1446.5 r270 top
C100 "1nF" Cap-0402 6856.94,1446.5 r270 top
C101 "10nF" Cap-0402 6900.24,1446.5 r270 top
C102 "DNP" Cap-0402 6821.1,1631.78 r270 top value=18pF
C103 "DNP" Cap-0402 6687.53,1631.78 r90 top value=18pF
C104 "0.1uF" Cap-0402 5866.04,1839 r180 top value=100nF
D1 "ESD9L5.0ST5G" SOD-923. 3038.43,338.89 r0 top
D2 "ESD9L5.0ST5G" SOD-923. 2946.09,338.89 r180 top
D3 "ESD9L5.0ST5G" SOD-923. 7535.11,2118.17 r270 top
D4 "ESD9L5.0ST5G" SOD-923. 7535.11,2198.24 r90 top
D5 "SD03" SOD-323 3226.5,3046.59 r180 top
D6 "SD03" SOD-323 3226.5,2936.35 r180 top
D7 "MM3Z3V3" SOD-323 7516.91,897.09 r0 top
D8 "MM3Z3V3" SOD-323 7516.91,1030.09 r0 top
D9 "MM3Z3V3" SOD-323 7516.91,1163.09 r0 top
D10 "MM3Z3V3" SOD-323 7516.91,1296.09 r0 top
D11 "MM3Z3V3" SOD-323 7516.91,1429.09 r0 top
D12 "MM3Z3V3" SOD-323 7516.91,1562.09 r0 top
D13 "MM3Z3V3" SOD-323 7516.91,1695.09 r0 top
D14 "MM3Z3V3" SOD-323 7516.91,1828.09 r0 top
D15 "MM3Z3V3" SOD-323 7453.1,4100.13 r270 top
D16 "MM3Z3V3" SOD-323 7521.04,4100.13 r270 top
D17 "SS56" SMA 416,3093.33 r270 top
D19 "SMBJ28A-13-F" SMB_ 541.23,2159.59 r90 top value=330pF
D20 "PESD5V0H1BSFYL" DSN0603-2 4047.31,3951.65 r180 top
D21 "CDSOT23-T24CAN-Q" SOT-23 4051.32,4434.28 r0 top
D22 "PESD5V0H1BSFYL" DSN0603-2 3204.23,3951.65 r180 top
D23 "CDSOT23-T24CAN-Q" SOT-23 3208.32,4434.28 r0 top
D24 "SM712" SOT-23 1079.32,4297.65 r180 top
D25 "SMBJ8.0CA" "SMB Bi Directional" 827,1454.56 r90 top
D26 "SMBJ8.0CA" "SMB Bi Directional" 827,1761.66 r270 top
D27 "SMBJ8.0CA" "SMB Bi Directional" 736.45,944.02 r180 top
D28 "SMBJ8.0CA" "SMB Bi Directional" 736.45,744.11 r180 top
D29 "SM712" SOT-23 1843.32,4297.65 r180 top
D30 "SM712" SOT-23 2607.32,4297.65 r180 top
F1 "MF-MSMF010-2" Fuse-1812_ 1003.32,4503.61 r90 top
F2 "MF-MSMF010-2" Fuse-1812_ 1155.32,4503.61 r90 top
F3 "MF-MSMF010-2" Fuse-1812_ 606.03,1688.11 r0 top
F4 "MF-MSMF010-2" Fuse-1812_ 606.03,1528.11 r0 top
F5 "SMD0805P020TF" Fuse-0805 506.43,767.42 r270 top
F6 "SMD0805P020TF" Fuse-0805 506.43,920.72 r90 top
F7 "MF-MSMF010-2" Fuse-1812_ 1767.32,4503.61 r90 top
F8 "MF-MSMF010-2" Fuse-1812_ 2531.32,4503.61 r90 top
F9 "MF-MSMF010-2" Fuse-1812_ 1919.32,4503.61 r90 top
F10 "MF-MSMF010-2" Fuse-1812_ 2683.32,4503.61 r90 top
FB1 "BLM18PG221SN1D" "IND-0603 (1608 Metric)" 3165.38,335.89 r0 top value=100mR
FB2 "BLM18PG221SN1D" "IND-0603 (1608 Metric)" 7538.11,2331.31 r90 top value=100mR
FB3 "120R" "IND-0603 (1608 Metric)" 6522.1,1260.55 r220 top
FB4 "120R" "IND-0603 (1608 Metric)" 6266.73,1261.02 r320 top
FB5 "BLM18PG221SN1D" "IND-0603 (1608 Metric)" 7524.03,4474.4 r0 top value=100mR
FB6 "BLM18PG221SN1D" "IND-0603 (1608 Metric)" 5910.16,3271.72 r180 top value=100mR
FB7 "BLM18PG221SN1D" "IND-0603 (1608 Metric)" 5408.97,3271.72 r0 top value=100mR
FB8 "BLM18PG221SN1D" "IND-0603 (1608 Metric)" 5274.74,3046.87 r180 top value=100mR
FB9 "BLM18PG221SN1D" "IND-0603 (1608 Metric)" 5637.93,3346.83 r180 top value=100mR
J1 "TYPE-C-31-M-12" TYPE-C-31-M-12_ 3011.84,140.4 r0 top
J2 "HC-XH-2A-G" HC-XH-2A-G 7770.22,2599.63 r90 top
J3 "Voltlink Target" "Voltlink Target" 4036.53,472.32 r90 top
J4 "HC-XH-2A-G" HC-XH-2A-G 7770.22,3014.86 r90 top
J5 "HC-XH-2A-G" HC-XH-2A-G 7770.22,3430.09 r90 top
J6 "HC-XH-2A-G" HC-XH-2A-G 7770.22,3845.33 r90 top
J7 "TYPE-C-31-M-12" TYPE-C-31-M-12_ 7733.6,2177.77 r90 top
J8 "2-406549-1" 2-406549-1 5909.08,446.88 r0 top
J9 "X6511WV-09H-C60D30" "HDR 1X9 male" 7806,1327.85 r270 top
J10 "68000-103HLF" HDR1X3_ 4269.27,3385.42 r0 top
J11 "X6511WV-05H-C60D30" HDR1X5_ 4069.27,3248.42 r0 top
J12 "X6511WV-04H-C60D30" HDR1X4_ 7805,4120.5 r90 top
J13 "B3B-XH-A(LF)(SN)" B3B-XH-A(LF)(SN)_ 3560,2403.11 r0 top
J14 "178.6165.0002" 178.6165.0002 128.35,2870.83 r90 top
J15 "1715721" 1715721 181.23,2169.9 r270 top
J16 "2-406549-1" 2-406549-1 6864.16,448.92 r0 top
J17 "X6511WV-02H-C60D30" HDR1X2_ 3994.32,4285.65 r180 top
J18 "X12ADIWA3DY1027" X12ADIWA3DY1027 4135.32,4836.61 r180 top
J19 "X6511WV-02H-C60D30" HDR1X2_ 4209.86,4285.65 r180 top
J20 "X6511WV-02H-C60D30" HDR1X2_ 3151.32,4285.65 r180 top
J22 "X12ADIWA3DY1027" X12ADIWA3DY1027 3292.32,4836.61 r180 top
J23 "X6511WV-02H-C60D30" HDR1X2_ 3366.32,4285.65 r180 top
J24 "AFC07-S32ECA-00" AFC07-S32ECA-00 2079.97,1806.24 r90 top
J25 "B4B-XH-A(LF)(SN)" B4B-XH-A(LF)(SN). 4280.41,2031.62 r270 top
J26 "X6511WV-02H-C60D30" HDR1X2_ 1144.72,4121.65 r180 top
J27 "X6511WV-02H-C60D30" HDR1X2_ 1908.72,4121.65 r180 top
J28 "X6511WV-02H-C60D30" HDR1X2_ 2672.72,4121.65 r180 top
J29 "DB128L-5.08-3P-BK-S" DB128L-5.08-3P-BK-S 979.32,4918.65 r180 top
J30 "DB128L-5.08-3P-BK-S" DB128L-5.08-3P-BK-S 1743.32,4918.65 r180 top
J31 "DB128L-5.08-3P-BK-S" DB128L-5.08-3P-BK-S 2507.32,4918.65 r180 top
J32 "DB128L-5.08-3P-BK-S" DB128L-5.08-3P-BK-S 191,1508.11 r270 top
J33 "DB128L-5.08-3P-BK-S" DB128L-5.08-3P-BK-S 191,744.11 r270 top
J34 "HR911105A" HR911105A 6071.15,4609.65 r0 top
J35 "HR911105A" HR911105A 5148.32,4609.65 r0 top
J36 "T44001" T44001 184.02,4517.09 r0 top
L1 "BLM15AG601SN1D" IND-0402 3334.27,2972.64 r270 top
L2 "6.8uH" 0630CDMCCDS_6R8MC 814.15,2422.15 r0 top
LED1 "RED" LED-0603 74.84,3775.02 r180 top
LED2 "RED" LED-0603 74.84,3928.02 r180 top
LED3 "RED" LED-0603 74.84,4081.02 r180 top
LED4 "Emerald" LED-0603 6608.15,4420.17 r90 top
LED5 "RED" LED-0603 4664.63,4420.17 r90 top
LED6 "Emerald" LED-0603 3755.53,3633.11 r0 top
LED7 "RED" LED-0603 3707.02,490.74 r180 top
LED8 "RED" LED-0603 3707.02,431.69 r180 top
Q1 "SS8050-G" SOT-23 3774,591.67 r180 top
Q2 "SS8050-G" SOT-23 3774,787.67 r0 top
Q3 "BSS138" Sot-23 1787.07,2168.18 r0 top
R1 "5.1K" Res-0402 2911.27,401.89 r0 top
R2 "5.1K" Res-0402 3062.24,401.89 r180 top
R3 "1M" Res-0402 3289.84,128.46 r90 top
R4 "10K" Res-0402 5397.23,330.97 r270 top
R5 "10K" Res-0402 4615.5,1171.74 r180 top
R6 "10K" Res-0402 5032.5,1165.44 r0 top
R7 "10K" Res-0402 5032.5,1205.77 r0 top
R8 "2K" Res-0402 3452.12,278.87 r90 top value=2kR
R9 "DNP" Res-0402 3165.38,381.4 r180 top
R10 "4.7K" Res-0402 4423.5,1124.13 r0 top
R11 "4.7K" Res-0402 4500.57,1124.13 r180 top
R12 "DNP" Res-0402 7492.6,2331.31 r270 top
R13 "DNP" Res-0603 3339.9,3274.04 r0 top
R14 "DNP" Res-0603 3339.9,3223.04 r0 top
R15 "5.1K" Res-0402 7472.11,2080.14 r90 top
R16 "5.1K" Res-0402 7472.11,2228.17 r270 top
R17 "1M" Res-0402 7745.54,1893.11 r180 top
R18 "0R" Res-0603 3269.46,2813.84 r90 top
R19 "0R" Res-0603 3322.46,2813.84 r90 top
R20 "10K" Res-0402 3145.96,2862.34 r270 top
R21 "4.7K" Res-0402 3426.34,2621.56 r180 top
R22 "4.7K" Res-0402 3498.59,2621.56 r0 top
R23 "33R" Res-0402 7543.68,1883 r0 top
R24 "33R" Res-0402 7543.68,1750.43 r0 top
R25 "10K" Res-0402 4169.27,3366.92 r270 top
R26 "33R" Res-0402 7543.68,1617.85 r0 top
R27 "33R" Res-0402 7543.68,1485.28 r0 top
R28 "33R" Res-0402 7543.68,1352.71 r0 top
R29 "33R" Res-0402 7543.68,1220.14 r0 top
R30 "33R" Res-0402 7543.68,1087.57 r0 top
R31 "33R" Res-0402 7543.68,955 r0 top
R32 "10K" Res-0402 7367.1,4321.33 r270 top
R33 "10K" Res-0402 2610.69,2492.68 r0 top
R34 "10K" Res-0402 2728.44,2474.18 r270 top
R35 "10K" Res-0402 2767.63,2474.18 r270 top
R36 "10K" Res-0402 2807.22,2474.18 r270 top
R37 "0R" Res-0402 7398.04,4119.9 r270 top
R38 "0R" Res-0402 7577.04,4119.9 r270 top
R39 "10K" Res-0402 2807.41,2902.45 r270 top
R40 "10K" Res-0402 2707.41,2902.45 r270 top
R41 "10K" Res-0402 2607.41,2902.45 r270 top
R42 "158K" Res-0402 874.8,2766.15 r90 top
R43 "30.1K" Res-0402 833.68,2766.15 r270 top
R44 "3.9K" Res-0402 161.81,3775.02 r180 top value=3.9kR
R45 "470R" Res-0402 161.81,3928.02 r180 top
R46 "200R" Res-0402 161.81,4081.02 r180 top
R47 "33K" Res-0402 4132.31,4183.65 r0 top
R48 "60.4R" Res-0603 4259.85,4106.65 r0 top
R49 "0R" Res-0402 4078.81,3873.65 r270 top
R50 "0R" Res-0402 3999.34,3873.65 r270 top
R51 "100K" Res-0402 4209.85,4028.72 r270 top
R52 "0R" Res-0402 4294.37,4473.65 r180 top
R53 "0R" Res-0402 4217.21,4473.65 r0 top
R54 "60.4R" Res-0603 4259.85,4157.65 r180 top
R55 "33K" Res-0402 3289.32,4183.65 r0 top
R56 "60.4R" Res-0603 3416.32,4106.65 r0 top
R57 "0R" Res-0402 3235.73,3873.65 r270 top
R58 "0R" Res-0402 3156.27,3873.65 r270 top
R59 "100K" Res-0402 3366.32,4028.72 r270 top
R60 "0R" Res-0402 3451.37,4473.65 r180 top
R61 "60.4R" Res-0603 3416.32,4157.65 r180 top
R62 "0R" Res-0402 3374.21,4473.65 r0 top
R63 "10K" Res-0402 4408,1848.36 r270 top
R64 "10K" Res-0402 4630.46,1848.55 r270 top
R65 "0R" Res-0402 1853.97,1540.43 r0 top
R66 "0R" Res-0402 1853.97,1579.8 r0 top
R67 "0R" Res-0402 1853.97,1619.17 r0 top
R68 "0R" Res-0402 1853.97,1658.54 r0 top
R69 "0R" Res-0402 1853.97,1697.91 r0 top
R70 "0R" Res-0402 1853.97,1737.28 r0 top
R71 "0R" Res-0402 1853.97,1776.65 r0 top
R72 "22.1K" Res-0603 3345.99,267.37 r90 top
R73 "220R" Res-0603 3810.49,490.74 r0 top
R74 "47.5K" Res-0603 3397,267.37 r90 top
R75 "220R" Res-0603 3810.49,431.69 r0 top
R76 "10K" Res-0402 3811,689.8 r270 top
R77 "10K" Res-0402 3736.6,689.8 r90 top
R78 "49.9R" Res-0603 4212,977.9 r270 top
R79 "DNP" Res-0603 4242,798 r0 top
R80 "DNP" Res-0603 4242,848 r0 top
R81 "49.9R" Res-0603 4242,548 r0 top
R82 "49.9R" Res-0603 4242,648 r0 top
R83 "49.9R" Res-0603 4242,398 r0 top
R84 "49.9R" Res-0603 5146.54,748 r180 top
R85 "49.9R" Res-0603 5146.54,798 r180 top
R86 "49.9R" Res-0603 5146.54,848 r180 top
R87 "0R" Res-0603 4242,698 r0 top
R88 "0R" Res-0603 4242,348 r0 top
R89 "220R" Res-0603 3649.43,3633.11 r0 top
R90 "0R" Res-0603 5146.54,648 r180 top
R91 "10K" Res-0402 4513.46,1696.86 r180 top
R92 "10K" Res-0402 1932.97,1974.13 r180 top
R93 "0R" Res-0402 1932.97,2013.87 r0 top
R94 "0R" Res-0402 1932.97,2052.87 r0 top
R95 "0R" Res-0402 1932.97,2091.87 r0 top
R96 "0R" Res-0402 4574.48,1678.36 r270 top
R97 "2.2R" Res-0603 1881.07,2177.55 r270 top
R98 "0R" Res-0402 4452.43,1678.36 r270 top
R99 "0R" Res-0402 4574.48,1848.36 r270 top
R100 "0R" Res-0402 4452.43,1848.36 r270 top
R101 "33R" Res-0402 1689.07,2147.31 r270 top
R102 "10K" Res-0402 1787.07,2076.2 r0 top
R103 "4.7K" Res-0402 985.7,3890.41 r180 top
R104 "4.7K" Res-0402 1108.82,3843.65 r0 top
R105 "4.7K" Res-0402 1108.82,3806.57 r0 top
R106 "4.7K" Res-0402 1194.82,3890.41 r0 top
R107 "4.7K" Res-0402 1056.75,4036.74 r180 top
R108 "0R" Res-0402 1004.2,3825.15 r90 top
R109 "0R" Res-0402 1368.5,1587.99 r0 top
R110 "22R" Res-0201 1116.72,4224.02 r90 top
R111 "0R" Res-0402 1368.5,1537.99 r0 top
R112 "22R" Res-0201 1144.72,4224.02 r90 top
R113 "22R" Res-0201 999.17,1487.99 r0 top
R114 "0R" Res-0402 1368.5,1487.99 r0 top
R115 "0R" Res-0402 1176.32,3825.15 r90 top
R116 "4.7K" Res-0402 1124.86,4036.74 r180 top
R117 "22R" Res-0201 999.17,1437.99 r0 top
R118 "0R" Res-0402 1368.5,1437.99 r0 top
R119 "120R" Res-0603 1049.32,4204.88 r180 top
R120 "22R" Res-0201 1360.83,1637.99 r180 top
R121 "22R" Res-0201 1360.83,1687.99 r180 top
R122 "4.7K" Res-0402 1749.7,3890.41 r180 top
R123 "4.7K" Res-0402 1872.82,3843.65 r0 top
R124 "4.7K" Res-0402 1872.82,3806.57 r0 top
R125 "4.7K" Res-0402 1958.82,3890.41 r0 top
R126 "4.7K" Res-0402 2513.7,3890.41 r180 top
R127 "4.7K" Res-0402 2636.82,3843.65 r0 top
R128 "4.7K" Res-0402 2636.82,3806.57 r0 top
R129 "4.7K" Res-0402 2722.82,3890.41 r0 top
R130 "4.7K" Res-0402 1820.75,4036.74 r180 top
R131 "4.7K" Res-0402 2584.75,4036.74 r180 top
R132 "0R" Res-0402 1768.2,3825.15 r90 top
R133 "0R" Res-0402 2532.2,3825.15 r90 top
R134 "22R" Res-0201 1880.72,4224.02 r90 top
R135 "22R" Res-0201 2644.72,4224.02 r90 top
R136 "22R" Res-0201 1908.72,4224.02 r90 top
R137 "22R" Res-0201 2672.72,4224.02 r90 top
R138 "0R" Res-0402 1940.32,3825.15 r90 top
R139 "0R" Res-0402 2704.32,3825.15 r90 top
R140 "4.7K" Res-0402 1888.86,4036.74 r180 top
R141 "4.7K" Res-0402 2652.86,4036.74 r180 top
R142 "120R" Res-0603 1813.32,4204.88 r180 top
R143 "120R" Res-0603 2577.32,4204.88 r180 top
R144 "10K" Res-0402 5290.8,2846.33 r0 top
R145 "49.9R" Res-0603 5972.32,4219.65 r180 top
R146 "49.9R" Res-0603 6076.34,4219.65 r0 top
R147 "49.9R" Res-0603 6213.32,4219.65 r180 top
R148 "49.9R" Res-0603 6317.32,4219.65 r0 top
R149 "0R" Res-0402 6153.82,4167.65 r0 top
R150 "330R" Res-0603 6476.32,4851.1 r90 top
R151 "49.9R" Res-0603 5049.49,4219.65 r180 top
R152 "49.9R" Res-0603 5153.52,4219.65 r0 top
R153 "49.9R" Res-0603 5290.49,4219.65 r180 top
R154 "49.9R" Res-0603 5394.49,4219.65 r0 top
R155 "0R" Res-0402 5230.99,4167.65 r0 top
R156 "12.1k" Res-0402 5647.43,3249.33 r270 top
R157 "10K" Res-0402 5960.8,3007.5 r180 top
R158 "DNP" Res-0402 5320.8,2963.21 r180 top
R159 "4.7K" Res-0402 5249.8,2963.21 r0 top
R160 "330R" Res-0603 5555.32,4851.1 r90 top
R161 "4.7K" Res-0402 5979.3,2882.47 r270 top
R162 "4.7K" Res-0402 5979.3,2952 r90 top
R163 "330R" Res-0603 6549.83,4424.17 r270 top
R164 "330R" Res-0603 4606.32,4424.17 r270 top
R165 "10K" Res-0402 6577.83,4348.86 r0 top
R166 "10K" Res-0402 4634.32,4348.65 r0 top
R167 "10K" Res-0402 6427.32,4839.6 r270 top
R168 "10K" Res-0402 5503.32,4839.6 r270 top
R169 "10K" Res-0201 6195.8,2867 r270 top
R170 "0R" Res-0603 5146.54,698 r180 top
R171 "0R" Res-0603 4242,748 r0 top
R172 "0R" Res-0603 4440.5,1065 r0 top
R173 "10K" Res-0402 5032.5,1248.51 r0 top
R174 "0R" Res-0603 4152,420.64 r90 top
R175 "0R" Res-0603 4152,524.01 r270 top
R176 "10K" Res-0402 4621.5,1402 r0 top
R177 "220R" Res-0603 5618.21,674.96 r180 top
R178 "51R" Res-0603 5479.04,665.16 r180 top
R179 "51R" Res-0603 5479.04,611 r180 top
R180 "51R" Res-0603 5479.04,505 r180 top
R181 "220R" Res-0603 6200.37,674.96 r0 top
R182 "51R" Res-0603 5479.04,558.08 r180 top
R183 "49.9R" Res-0603 6086.6,1228.05 r180 top
R184 "49.9R" Res-0603 5981.56,1228.05 r0 top
R185 "49.9R" Res-0603 5836.6,1228.05 r180 top
R186 "49.9R" Res-0603 5731.56,1228.05 r0 top
R187 "75R" Res-0603 5459.04,792 r90 top
R188 "51R" Res-0603 5400.04,638.5 r90 top
R189 "51R" Res-0603 5400.04,532 r270 top
R190 "5.1K" Res-0402 6207.65,1956.21 r90 top
R191 "10K" Res-0402 6138.91,1582.11 r0 top
R192 "220R" Res-0603 6573.16,677 r180 top
R193 "1K" Res-0402 6138.91,1543 r0 top
R194 "51R" Res-0603 6431,666 r180 top
R195 "11.8K" Res-0603 6394.67,1224.89 r270 top
R196 "51R" Res-0603 6431,611.84 r180 top
R197 "51R" Res-0603 6431,505.08 r180 top
R198 "220R" Res-0603 7155.16,677 r0 top
R199 "51R" Res-0603 6431,559.16 r180 top
R200 "49.9R" Res-0603 7041.68,1230.09 r180 top
R201 "49.9R" Res-0603 6936.64,1230.09 r0 top
R202 "49.9R" Res-0603 6791.68,1230.09 r180 top
R203 "49.9R" Res-0603 6686.64,1230.09 r0 top
R204 "75R" Res-0603 6411,792 r90 top
R205 "51R" Res-0603 6352,638.92 r90 top
R206 "51R" Res-0603 6352,532.08 r270 top
R207 "0R" Res-0402 6553.04,1940.68 r90 top
R208 "DNP" Res-0402 6821.1,1838.75 r270 top
R209 "0R" Res-0402 6647.04,1502.5 r270 top
R210 "0R" Res-0402 6434.04,1940.68 r270 top
R211 "0R" Res-0402 6473.41,1940.68 r270 top
R212 "0R" Res-0402 6512.78,1940.68 r270 top
R213 "10K" Res-0402 6852.1,1505.51 r180 top
R214 "DNP" Res-0402 6647.04,1594.78 r90 top value=1MR
R215 "5.1K" Res-0402 5735,1851.5 r270 top
R216 "5.1K" Res-0402 5735,1651.5 r270 top
R217 "1K" Res-0402 7233,5068.5 r270 top
R218 "1K" Res-0402 7133,5068.5 r270 top
R219 "1K" Res-0402 7033,5068.5 r270 top
R220 "1K" Res-0402 6933,5068.5 r270 top
R221 "1K" Res-0402 6833,5068.5 r270 top
R222 "1K" Res-0402 6733,5068.5 r270 top
R223 "1K" Res-0402 6633,5068.5 r270 top
R224 "1K" Res-0402 5229,1752.5 r90 top
R225 "1K" Res-0402 5229,1567.5 r270 top
R226 "1K" Res-0402 5229,1467.5 r270 top
R227 "DNP" Res-0402 6795.13,1557 r0 top
R228 "0R" Res-0402 6864.74,1631.78 r270 top
R229 "0R" Res-0402 6885.24,1557 r180 top
R230 "0R" Res-0402 6905.74,1631.78 r270 top
SW1 "B3U-1000P" B3U-1000P 5316.23,333.97 r90 top
SW2 "SKSTACE010" SKSTACE010_ 7367,2599.62 r180 top
SW3 "SKSTACE010" SKSTACE010_ 7367,3014.86 r180 top
SW4 "SKSTACE010" SKSTACE010_ 7367,3430.09 r180 top
SW5 "SKSTACE010" SKSTACE010_ 7367,3845.33 r180 top
SW6 "B3U-1000P" B3U-1000P 3025.96,2862.34 r90 top
SW7 "DSIC03LSGET" DSIC03LSGET 2707.41,3173.95 r90 top
SW8 "B3U-1000P" B3U-1000P 5290.8,2725.33 r0 top
SW9 "B3U-1000P" B3U-1000P 3986.82,760.11 r90 top
SW10 "DSIC07LS-P" DSIC07LS-P 6933,4794.8 r180 top
SW11 "DSIC05LS-P" DSIC05LS-P_ 5482.07,1660 r0 top
T1 "H1102NL" H1102NLT 5909.08,948.91 r270 top value=350uH
T2 "H1102NL" H1102NLT 6864.16,950.95 r270 top value=350uH
TP1 "TEST POINT" Test-point 278.31,3775.02 r180 top
TP2 "TEST POINT" Test-point 278.31,3928.02 r0 top
TP3 "TEST POINT" Test-point 278.31,4081.02 r0 top
TP4 "TEST POINT" Test-point 278.31,4234.02 r0 top
TP5 "TEST POINT" Test-point 5122.8,2725.33 r0 top
TP6 "TEST POINT 0.5mm Dia" "Test-point - 0.5mm" 6262.77,2042.35 r220 top
TP7 "TEST POINT 0.5mm Dia" "Test-point - 0.5mm" 6207.65,1889.5 r180 top
U1 "CP2102N-A02-GQFN28R" "28-QFN (5x5)_" 3491.49,451.37 r0 top
U2 "STM32G0B1RET6" LQFP-64(10x10) 3699.27,2932.42 r0 top
U3 "PCF8574APWR" TSSOP-20 2707.35,2674.94 r90 top
U4 "ADS1115IDGSR" VSSOP-10 7457.1,4321.33 r90 top
U5 "PCA9536D,118" SOP-8 2323.08,2668.45 r270 top
U6 "ESP32-WROOM-32E-N16" "38-SMD Module" 4694.27,647.61 r180 top
U7 "AP63300WU-7" TSOT-23-6 694.8,2706.15 r270 top
U8 "BL8071CLATR33" "SOT- 223" 1255.55,2801.23 r0 top
U9 "TCAN1463DMTRQ1" VSON-14(3x4.5) 4089.8,4090.53 r90 top
U10 "TCAN1463DMTRQ1" VSON-14(3x4.5) 3246.73,4090.53 r90 top
U11 "PCF8574APWR" TSSOP-20 4825.23,1286.9 r0 top
U12 "AT24C02C-SSHM-T" "SOIC-8(0.154\", 3.90mm Width)" 5916.04,1673 r90 top
U13 "TXB0102DCUR" VSSOP-8(3.1x2.1) 4513.46,1763.86 r0 top
U14 "MAX3232ESE" SOP-16 1176,1612.99 r0 top
U15 "THVD2450DRBR" SON-8-EP(3x3) 1090.52,3945.53 r90 top
U16 "THVD2450DRBR" SON-8-EP(3x3) 1854.52,3945.53 r90 top
U17 "THVD2450DRBR" SON-8-EP(3x3) 2618.52,3945.53 r90 top
U18 "LAN9253-SVB QFN64" QFN-64-EP(9x9) 5657.27,2938.6 r0 top
U19 "CAT24C256WI-GT3" CAT24C256WI-GT3 6170.8,3040.83 r270 top
U20 "KSZ8863RLLI" "48-LQFP (7x7)" 6404.5,1673.68 r90 top
X1 "DNP" MC-306 3121.63,3249.55 r180 top value=32.786kHz
X2 "8MHz" 5TJ480000XYLBC_ 3269.46,2677.84 r0 top
X3 "25MHz" SMD3225-4P 5274.74,3195.53 r270 top
X4 "25MHz" SMD2520-4P 6731.99,1475 r180 top
X5 "DNP" Q22FA12800090 6731.36,1602.92 r90 top

## Footprints (in the part's own frame and the unit in brackets; to place one, negate y for a bottom-side part, rotate by r counter-clockwise, add the part's x,y. Pads: shape width x height; smd on the part's side, far side on the other; paste and mask are expansions set on the pad)
2-406549-1 [mil]
  round 60 hole 35.43 paste-99999 mask+2: 1(139.76,-129.92) 2(99.6,-59.84) 3(59.84,-129.92) 4(19.68,-59.84) 5(-20.08,-129.92) 6(-60.24,-59.84) 7(-100,-129.92) 8(-140.16,-59.84) 9(-270.08,129.92) 10(-179.92,129.92) 11(179.92,129.92) 12(270.08,129.92)
  round 86.61 hole 61.81 paste-99999 mask+2: 13(-320.08,-94.88) 14(320.08,-94.88)
  round 0 hole 127.95 unplated paste-99999 mask+2: MH(-250,-229.92) MH(250,-229.92)
  silkscreen extent -340,-440 340,190, body extent -363,-448 363,184, height 574
5TJ480000XYLBC_ [mm]
  rect 1.8x1.3 smd mask+0.07: 1(-1.9,-1.15) 2(1.9,-1.15) 3(1.9,1.15) 4(-1.9,1.15)
  silkscreen extent -3.05,-1.65 2.54,1.65, body extent -2.5,-1.6 2.5,1.6, height 1
"28-QFN (5x5)_" [mm]
  rect 0.95x0.3 smd: 1(-2.4,1.5) 2(-2.4,1) 3(-2.4,0.5) 4(-2.4,0) 5(-2.4,-0.5) 6(-2.4,-1) 7(-2.4,-1.5) 15(2.4,-1.5) 16(2.4,-1) 17(2.4,-0.5) 18(2.4,0) 19(2.4,0.5) 20(2.4,1) 21(2.4,1.5)
  rect 0.3x0.95 smd: 8(-1.5,-2.4) 9(-1,-2.4) 10(-0.5,-2.4) 11(0,-2.4) 12(0.5,-2.4) 13(1,-2.4) 14(1.5,-2.4) 22(1.5,2.4) 23(1,2.4) 24(0.5,2.4) 25(0,2.4) 26(-0.5,2.4) 27(-1,2.4) 28(-1.5,2.4)
  rect 3.35x3.35 smd: 29(0,0)
  silkscreen extent -3.15,-2.54 2.54,2.54, body extent -2.5,-2.5 2.5,2.5, height 1
"38-SMD Module" [mm]
  rect 1.5x0.9 smd: 1(-8.75,8.88) 2(-8.75,7.61) 3(-8.75,6.34) 4(-8.75,5.07) 5(-8.75,3.8) 6(-8.75,2.53) 7(-8.75,1.26) 8(-8.75,-0.01) 9(-8.75,-1.28) 10(-8.75,-2.55) 11(-8.75,-3.82) 12(-8.75,-5.09) 13(-8.75,-6.36) 14(-8.75,-7.63) 25(8.75,-7.63) 26(8.75,-6.36) 27(8.75,-5.09) 28(8.75,-3.82) 29(8.75,-2.55) 30(8.75,-1.28) 31(8.75,-0.01) 32(8.75,1.26) 33(8.75,2.53) 34(8.75,3.8) 35(8.75,5.07) 36(8.75,6.34) 37(8.75,7.61) 38(8.75,8.88)
  rect 0.9x1.5 smd: 15(-5.71,-8.88) 16(-4.44,-8.88) 17(-3.17,-8.88) 18(-1.9,-8.88) 19(-0.63,-8.88) 20(0.64,-8.88) 21(1.91,-8.88) 22(3.18,-8.88) 23(4.45,-8.88) 24(5.72,-8.88)
  rect 0.9x0.9 smd: 39(-2.65,2.56) 40(-1.25,2.56) 41(0.15,2.56) 42(-2.65,1.16) 43(-1.25,1.16) 44(0.15,1.16) 45(-2.65,-0.24) 46(-1.25,-0.24) 47(0.15,-0.24)
  round 0.6 hole 0.3 mask+0: 39_10(-1.95,2.56) 39_11(-0.55,2.56) 39_12(-2.65,1.86) 39_13(-1.25,1.86) 39_14(0.15,1.86) 39_15(-1.95,1.16) 39_16(-0.55,1.16) 39_17(-2.65,0.46) 39_18(-1.25,0.46) 39_19(0.15,0.46) 39_20(-1.95,-0.24) 39_21(-0.55,-0.24)
  Keep-Out Layer region: -9.042,10.287 9.042,10.287 9.042,16.383 -9.042,16.383
  silkscreen extent -9.8,-9.22 9.09,16.43, body extent -9,-9.12 9,16.38, height 3.25
"48-LQFP (7x7)" [mm]
  rect 1.5x0.27 smd paste+0 mask+0.05: 1(-4.25,2.75) 2(-4.25,2.25) 3(-4.25,1.75) 4(-4.25,1.25) 5(-4.25,0.75) 6(-4.25,0.25) 7(-4.25,-0.25) 8(-4.25,-0.75) 9(-4.25,-1.25) 10(-4.25,-1.75) 11(-4.25,-2.25) 12(-4.25,-2.75) 25(4.25,-2.75) 26(4.25,-2.25) 27(4.25,-1.75) 28(4.25,-1.25) 29(4.25,-0.75) 30(4.25,-0.25) 31(4.25,0.25) 32(4.25,0.75) 33(4.25,1.25) 34(4.25,1.75) 35(4.25,2.25) 36(4.25,2.75)
  rect 0.27x1.5 smd paste+0 mask+0.05: 13(-2.75,-4.25) 14(-2.25,-4.25) 15(-1.75,-4.25) 16(-1.25,-4.25) 17(-0.75,-4.25) 18(-0.25,-4.25) 19(0.25,-4.25) 20(0.75,-4.25) 21(1.25,-4.25) 22(1.75,-4.25) 23(2.25,-4.25) 24(2.75,-4.25) 37(2.75,4.25) 38(2.25,4.25) 39(1.75,4.25) 40(1.25,4.25) 41(0.75,4.25) 42(0.25,4.25) 43(-0.25,4.25) 44(-0.75,4.25) 45(-1.25,4.25) 46(-1.75,4.25) 47(-2.25,4.25) 48(-2.75,4.25)
  silkscreen extent -5.31,-3.3 3.34,3.33, body extent -4.5,-4.5 4.5,4.5, height 1.6
178.6165.0002 [mm]
  rect 2.2x2.2 hole 1.5 paste-2539.97 mask+0.051: 1(-6.4,1.25)
  round 2.2 hole 1.5 paste-2539.97 mask+0.051: 2(-2.9,1.25) 3(2.9,1.25) 4(6.4,1.25) 5(6.4,-1.25) 6(2.9,-1.25) 7(-2.9,-1.25) 8(-6.4,-1.25)
  round 0 hole 2.5 unplated paste-2539.97: ""(0,0)
  silkscreen extent -10.03,-3.05 10.03,3.05, body extent -10,-3 10,3, height 17.5
0630CDMCCDS_6R8MC [mm]
  rect 2.35x3.5 smd: 1(-3.025,0) 2(3.025,0)
  silkscreen extent -3.71,-3.3 3.71,3.3, body extent -3.65,-3.3 3.65,3.3, height 3
1715721 [mm]
  rect 2.5x2.5 / inner round 2.5 / far side rect 2.5x2.5 hole 1.3: 1(-2.54,0)
  round 2.5 hole 1.3: 2(2.54,0)
  silkscreen extent -5.08,-4.6 5.08,5.2, body extent -5.64,-4.62 5.09,5.21, height 14.2
AFC07-S32ECA-00 [mm]
  rect 0.3x1.2 smd paste+0 mask+0.051: 1(-7.735,1.079) 2(-7.235,1.079) 3(-6.735,1.079) 4(-6.235,1.079) 5(-5.735,1.079) 6(-5.235,1.079) 7(-4.735,1.079) 8(-4.236,1.079) 9(-3.736,1.079) 10(-3.236,1.079) 11(-2.736,1.079) 12(-2.236,1.079) 13(-1.736,1.079) 14(-1.235,1.079) 15(-0.735,1.079) 16(-0.235,1.079) 17(0.265,1.079) 18(0.765,1.079) 19(1.265,1.079) 20(1.765,1.08) 21(2.265,1.08) 22(2.765,1.08) 23(3.265,1.08) 24(3.765,1.08) 25(4.265,1.08) 26(4.765,1.08) 27(5.265,1.08) 28(5.765,1.08) 29(6.265,1.08) 30(6.765,1.08) 31(7.265,1.08) 32(7.765,1.08)
  rect 2.2x3.3 smd paste+0 mask+0.051: MP1(-9.386,-1.08) MP2(9.386,-1.079)
  silkscreen extent -10.8,-4.27 10.8,1.54, body extent -10.8,-3.89 10.8,1.31, height 2.01
B3B-XH-A(LF)(SN)_ [mm]
  rect 2x2 hole 1: 1(-3.81,0)
  round 2 hole 1: 2(-1.27,0) 3(1.27,0)
  silkscreen extent -6.32,-2.46 3.78,3.48, body extent -6.22,-2.36 3.68,3.39, height 7
B3U-1000P [mm] "SWITCH TACTILE SPST-NO 0.05A 12V"
  rect 0.82x1.72 smd: 1(-1.7,0) 2(1.7,0)
  silkscreen extent -1.57,-1.3 1.57,1.3, body extent -2,-1.26 2,1.24, height 1.6
B4B-XH-A(LF)(SN). [mm]
  rect 1.59x1.59 hole 1.06: 1(0,0)
  round 1.59 hole 1.06: 2(2.5,0) 3(5,0) 4(7.5,0)
  silkscreen extent -2.45,-3.4 9.95,2.35, body extent -2.45,-3.4 9.95,2.35, height 7
Cap-0402 [mil]
  rect 18x25 smd mask+2.36: 1(-18.5,0) 2(18.5,0)
  silkscreen extent -31,-16 31,16, body extent -20,-10 20,10, height 19
cap-0402 [mil]
  rect 18x25 smd mask+2.36: 1(-18.5,0) 2(18.5,0)
  silkscreen extent -31,-16 31,16, body extent -20,-10 20,10, height 19
Cap-0603 [mil]
  rect 30x35 smd mask+2.36: 1(-30,0) 2(30,0)
  silkscreen extent -49,-21 49,21, body extent -32,-16 31,16, height 34
Cap-0805 [mil] "SMD 0805"
  rect 40x60 smd mask+2.76: 1(-40,0) 2(40,0)
  silkscreen extent -64,-34 64,34, body extent -39,-25 39,25, height 30
Cap-1206 [mil] "SMD 1206"
  rect 60x70 smd: 1(-50,0) 2(50,0)
  silkscreen extent -84,-39 84,39, body extent -63,-31 63,32, height 39
CAT24C256WI-GT3 [mm]
  rect 1.57x0.62 smd: 1(-2.7,1.905) 2(-2.7,0.635) 3(-2.7,-0.635) 4(-2.7,-1.905) 5(2.7,-1.905) 6(2.7,-0.635) 7(2.7,0.635) 8(2.7,1.905)
  silkscreen extent -3,-2.44 1.85,2.64, body extent -3,-2.45 3,2.45, height 1.75
DB128L-5.08-3P-BK-S [mm]
  round 3 hole 1.6 paste-2539.97 mask+0.051: 1(-5.08,0) 2(0,0) 3(5.08,0)
  silkscreen extent -7.73,-4.85 8.22,5.15, body extent -7.62,-4.9 8.22,5.1, height 14
DSIC03LSGET [mil]
  rect 90x60 smd paste+0 mask+2: 1(-177.16,100) 2(-177.16,0) 3(-177.16,-100) 4(177.17,-100) 5(177.17,0) 6(177.17,100)
  silkscreen extent -118,-150 118,150, body extent -183,-150 183,150, height 163
DSIC05LS-P_ [mm]
  rect 1.7x1.1 smd: 1(-4.65,5.08) 2(-4.65,2.54) 3(-4.65,0) 4(-4.65,-2.54) 5(-4.65,-5.08) 6(4.65,-5.08) 7(4.65,-2.54) 8(4.65,0) 9(4.65,2.54) 10(4.65,5.08)
  silkscreen extent -5.8,-6.4 3.05,6.4, body extent -4.88,-6.33 4.88,6.37, height 4.15
DSIC07LS-P [mm]
  rect 1.7x2 smd paste+0 mask+0.051: 1(-7.62,-4.45) 2(-5.08,-4.45) 3(-2.54,-4.445) 4(0,-4.45) 5(2.54,-4.45) 6(5.08,-4.45) 7(7.62,-4.45) 8(7.62,4.45) 9(5.08,4.445) 10(2.54,4.45) 11(0,4.45) 12(-2.54,4.45) 13(-5.08,4.45) 14(-7.62,4.45)
  silkscreen extent -9.07,-5.79 9.07,3.1, body extent -8.89,-4.88 8.89,4.88, height 4.15
DSN0603-2 [mm]
  rect 0.2x0.24 smd mask+0.055: 1(-0.2,0) 2(0.2,0)
  silkscreen extent -0.38,-0.2 0.38,0.2, body extent -0.3,-0.15 0.3,0.15, height 0.32
Fuse-0805 [mm]
  rect 1x1.7 smd: 1(-1.1,0) 2(1.1,0)
  silkscreen extent -0.41,-0.81 0.41,0.81, body extent -1.1,-0.75 1.1,0.75, height 1.24
Fuse-1812_ [mm]
  rect 1.78x3.2 smd: 1(-2.49,0) 2(2.49,0)
  silkscreen extent -1.75,-1.8 1.85,1.8, body extent -2.36,-1.74 2.37,1.74, height 1.03
H1102NLT [mm]
  rect 1.67x0.76 smd: 1(-4.265,4.445) 2(-4.265,3.175) 3(-4.265,1.905) 4(-4.265,0.635) 5(-4.265,-0.635) 6(-4.265,-1.905) 7(-4.265,-3.175) 8(-4.265,-4.445) 9(4.265,-4.445) 10(4.265,-3.175) 11(4.265,-1.905) 12(4.265,-0.635) 13(4.265,0.635) 14(4.265,1.905) 15(4.265,3.175) 16(4.265,4.445)
  silkscreen extent -5.48,-6.35 3.55,6.35, body extent -4.7,-6.35 4.7,6.35, height 5.97
HC-XH-2A-G [mm]
  rect 1.524x1.5 hole 0.9 paste-2539.97 mask+0.05: 1(-1.25,0)
  round 1.5 hole 0.9 paste-2539.97 mask+0.05: 2(1.25,0)
  silkscreen extent -3.75,-2.4 3.75,3.5, body extent -3.75,-2.4 3.75,3.51, height 7
HDR1X2_ [mm] "CONN HEADER VERT 2POS 2.54MM"
  rect 1.5x1.5 hole 0.9: 1(0,0)
  round 1.5 hole 0.9: 2(2.54,0)
  silkscreen extent -1.27,-1.27 3.81,1.27, body extent -1.27,-1.27 3.81,1.27, height 8.44
HDR1X3_ [mm] "Connector; Header; 3 Position"
  rect 1.5x1.5 hole 0.9: 1(0,0)
  round 1.5 hole 0.9: 2(2.54,0) 3(5.08,0)
  silkscreen extent -1.27,-1.27 6.35,1.27, body extent -1.27,-1.24 6.35,1.25, height 8.54
HDR1X4_ [mm] "Connector; Header; 4 Position"
  rect 1.6x1.6 hole 0.95: 1(0,0)
  round 1.6 hole 0.95: 2(2.54,0) 3(5.08,0) 4(7.62,0)
  silkscreen extent -1.27,-1.27 8.89,1.27, body extent -1.27,-1.27 8.89,1.27, height 9.5
HDR1X5_ [mm] "Connector; Header; 5 Position"
  rect 1.6x1.6 hole 0.95: 1(0,0)
  round 1.6 hole 0.95: 2(2.54,0) 3(5.08,0) 4(7.62,0) 5(10.16,0)
  silkscreen extent -1.27,-1.27 11.43,1.27, body extent -1.27,-1.27 11.43,1.23, height 8.65
"HDR 1X9 male" [mm]
  rect 1.8x1.8 hole 1: 1(-10.16,0)
  round 1.8 hole 1: 2(-7.62,0) 3(-5.08,0) 4(-2.54,0) 5(0,0) 6(2.54,0) 7(5.08,0) 8(7.62,0) 9(10.16,0)
  silkscreen extent -11.48,-1.35 11.43,1.3, body extent -11.43,-1.3 11.43,1.24, height 8.34
HR911105A [mm]
  rect 1.398x1.398 hole 0.89: 1(4.45,-4.355)
  round 1.398 hole 0.89: 2(3.18,-6.895) 3(1.91,-4.355) 4(0.64,-6.895) 5(-0.63,-4.355) 6(-1.9,-6.895) 7(-3.17,-4.355) 8(-4.44,-6.895)
  round 1.53 hole 1.02: 9(6.625,6.895) 10(4.085,6.895) 11(-4.085,6.895) 12(-6.625,6.895)
  round 0 hole 3.25 unplated: MH1(-5.715,1.995) MH2(5.715,1.995)
  round 2.445 hole 1.63: "Shield 1"(-7.745,-1.055) "Shield 2"(7.745,-1.055)
  silkscreen extent -8,-8.48 8,12.92, body extent -8.02,-8.42 8.02,12.88, height 13.5
IND-0402 [mm]
  rect 0.4x0.6 smd: 1(-0.35,0) 2(0.35,0)
  silkscreen extent -0.71,-0.46 0.71,0.46, body extent -0.5,-0.25 0.5,0.25, height 0.25
"IND-0603 (1608 Metric)" [mm] "0.063\" L x 0.032\" W (1.60mm x 0.80mm)"
  rect 0.6x0.8 smd: 1(-0.7,0) 2(0.7,0)
  silkscreen extent -0.2,-0.46 0.23,0.46, body extent -0.8,-0.4 0.8,0.4, height 0.78
LED-0603 [mm]
  rect 0.5x1 smd: 1(-0.75,0) 2(0.75,0)
  silkscreen extent -1.12,-0.66 1.75,0.66, body extent -0.82,-0.37 0.82,0.36, height 0.68
LQFP-64(10x10) [mm]
  rect 1.2x0.3 smd paste+0 mask+0.051: 1(-5.75,3.75) 2(-5.75,3.25) 3(-5.75,2.75) 4(-5.75,2.25) 5(-5.75,1.75) 6(-5.75,1.25) 7(-5.75,0.75) 8(-5.75,0.25) 9(-5.75,-0.25) 10(-5.75,-0.75) 11(-5.75,-1.25) 12(-5.75,-1.75) 13(-5.75,-2.25) 14(-5.75,-2.75) 15(-5.75,-3.25) 16(-5.75,-3.75) 33(5.75,-3.75) 34(5.75,-3.25) 35(5.75,-2.75) 36(5.75,-2.25) 37(5.75,-1.75) 38(5.75,-1.25) 39(5.75,-0.75) 40(5.75,-0.25) 41(5.75,0.25) 42(5.75,0.75) 43(5.75,1.25) 44(5.75,1.75) 45(5.75,2.25) 46(5.75,2.75) 47(5.75,3.25) 48(5.75,3.75)
  rect 0.3x1.2 smd paste+0 mask+0.051: 17(-3.75,-5.75) 18(-3.25,-5.75) 19(-2.75,-5.75) 20(-2.25,-5.75) 21(-1.75,-5.75) 22(-1.25,-5.75) 23(-0.75,-5.75) 24(-0.25,-5.75) 25(0.25,-5.75) 26(0.75,-5.75) 27(1.25,-5.75) 28(1.75,-5.75) 29(2.25,-5.75) 30(2.75,-5.75) 31(3.25,-5.75) 32(3.75,-5.75) 49(3.75,5.75) 50(3.25,5.75) 51(2.75,5.75) 52(2.25,5.75) 53(1.75,5.75) 54(1.25,5.75) 55(0.75,5.75) 56(0.25,5.75) 57(-0.25,5.75) 58(-0.75,5.75) 59(-1.25,5.75) 60(-1.75,5.75) 61(-2.25,5.75) 62(-2.75,5.75) 63(-3.25,5.75) 64(-3.75,5.75)
  silkscreen extent -6.64,-5 5,5, body extent -6,-6 6,6, height 1.6
MC-306 [mm]
  rect 1.3x1.9 smd: 1(-2.75,-1.6) 2(2.75,-1.6) 3(2.75,1.6) 4(-2.75,1.6)
  silkscreen extent -4.06,-1.96 4.06,1.96, body extent -4,-1.9 4,1.9, height 2.54
Q22FA12800090 [mm]
  rect 0.95x0.85 smd: 1(0,-1.15) 2(1.45,-1.15) 3(1.45,0) 4(0,0)
  silkscreen extent -0.7,-1.41 0.78,0.29, body extent -0.3,-1.36 1.7,0.24, height 0.65
QFN-64-EP(9x9) [mm]
  rect 0.762x0.254 smd: 1(-4.4,3.75)
  rect 0.7x0.25 smd: 2(-4.4,3.25) 3(-4.4,2.75) 4(-4.4,2.25) 5(-4.4,1.75) 6(-4.4,1.25) 7(-4.4,0.75) 8(-4.4,0.25) 9(-4.4,-0.25) 10(-4.4,-0.75) 11(-4.4,-1.25) 12(-4.4,-1.75) 13(-4.4,-2.25) 14(-4.4,-2.75) 15(-4.4,-3.25) 16(-4.4,-3.75) 33(4.4,-3.75) 34(4.4,-3.25) 35(4.4,-2.75) 36(4.4,-2.25) 37(4.4,-1.75) 38(4.4,-1.25) 39(4.4,-0.75) 40(4.4,-0.25) 41(4.4,0.25) 42(4.4,0.75) 43(4.4,1.25) 44(4.4,1.75) 45(4.4,2.25) 46(4.4,2.75) 47(4.4,3.25) 48(4.4,3.75)
  rect 0.25x0.7 smd: 17(-3.75,-4.4) 18(-3.25,-4.4) 19(-2.75,-4.4) 20(-2.25,-4.4) 21(-1.75,-4.4) 22(-1.25,-4.4) 23(-0.75,-4.4) 24(-0.25,-4.4) 25(0.25,-4.4) 26(0.75,-4.4) 27(1.25,-4.4) 28(1.75,-4.4) 29(2.25,-4.4) 30(2.75,-4.4) 31(3.25,-4.4) 32(3.75,-4.4) 49(3.75,4.4) 50(3.25,4.4) 51(2.75,4.4) 52(2.25,4.4) 53(1.75,4.4) 54(1.25,4.4) 55(0.75,4.4) 56(0.25,4.4) 57(-0.25,4.4) 58(-0.75,4.4) 59(-1.25,4.4) 60(-1.75,4.4) 61(-2.25,4.4) 62(-2.75,4.4) 63(-3.25,4.4) 64(-3.75,4.4)
  rect 7.15x7.15 smd: 65(0,0)
  silkscreen extent -5,-4.5 4.54,4.5, body extent -4.52,-4.52 4.52,4.52, height 0.9
Res-0201 [mm]
  rect 0.27x0.37 smd mask+0.055: 1(-0.275,0) 2(0.275,0)
  silkscreen extent -0.48,-0.25 0.48,0.25, body extent -0.3,-0.15 0.3,0.15, height 0.29
Res-0402 [mil]
  rect 18x25 smd mask+2.17: 1(-18.5,0) 2(18.5,0)
  silkscreen extent -32,-17 32,16, body extent -23,-11 23,11, height 16
Res-0603 [mil]
  rect 30x35 smd: 1(-30,0) 2(30,0)
  silkscreen extent -48,-21 48,21, body extent -31,-17 31,17, height 18
SKSTACE010_ [mm]
  rect 1.9x2.8 smd: 1(-4.05,0) 2(4.05,0)
  silkscreen extent -4.34,-4.29 4.34,4.29, body extent -4.3,-4.25 4.3,4.25, height 4
SMA [mm]
  rect 2.5x1.7 smd: 1(-2,0) 2(2,0)
  silkscreen extent -4.45,-1.42 2.06,1.42, body extent -2.6,-1.3 2.6,1.3, height 2.4
"SMB Bi Directional" [mm]
  rect 2.8x2.4 smd: 1(-2.3,0) 2(2.3,0)
  silkscreen extent -2.21,-1.85 2.39,1.85, body extent -2.7,-1.8 2.7,1.8, height 2.3
SMB_ [mm]
  rect 2.8x2.4 smd: 1(-2.3,0) 2(2.3,0)
  silkscreen extent -2.21,-1.91 4.82,1.91, body extent -2.7,-1.8 2.7,1.8, height 2.3
SMD2520-4P [mm]
  rect 1x0.9 smd: 1(-0.925,-0.775) 2(0.925,-0.775) 3(0.925,0.775) 4(-0.925,0.775)
  silkscreen extent -1.73,-1.09 1.35,1.09, body extent -1.3,-1.05 1.3,1.05, height 0.55
SMD3225-4P [mm]
  rect 1.4x1.2 smd: 1(-1.1,-0.85) 2(1.1,-0.85) 3(1.1,0.85) 4(-1.1,0.85)
  silkscreen extent -2.08,-1.3 1.65,1.3, body extent -1.6,-1.25 1.6,1.25, height 0.81
SOD-323 [mm]
  rect 0.8x0.9 smd mask+0.055: 1(-1.15,0) 2(1.15,0)
  silkscreen extent -2.01,-0.79 0.94,0.79, body extent -1.3,-0.67 1.3,0.67, height 1.1
SOD-923. [mm]
  rect 0.36x0.27 smd: 1(-0.42,0) 2(0.42,0)
  silkscreen extent -1.12,-0.43 0.46,0.43, body extent -0.52,-0.32 0.53,0.33, height 0.43